# Altium PCB PCB_Interface_Board_7500-0428.PcbDoc (part 1 of 5)
Units mil, origin at the board's own origin, x right, y up, seen from the top; angles counter-clockwise.
Board outline 3850 x 4150 mil, 4 copper layers (Top Layer 1, GND+Signal, PWR+Signal, Bottom Layer 1), stack 62.449 mil thick; 247 components, 137 nets, 1675 pads, 241 vias.
Unrouted connection lines stored in the file: 122.
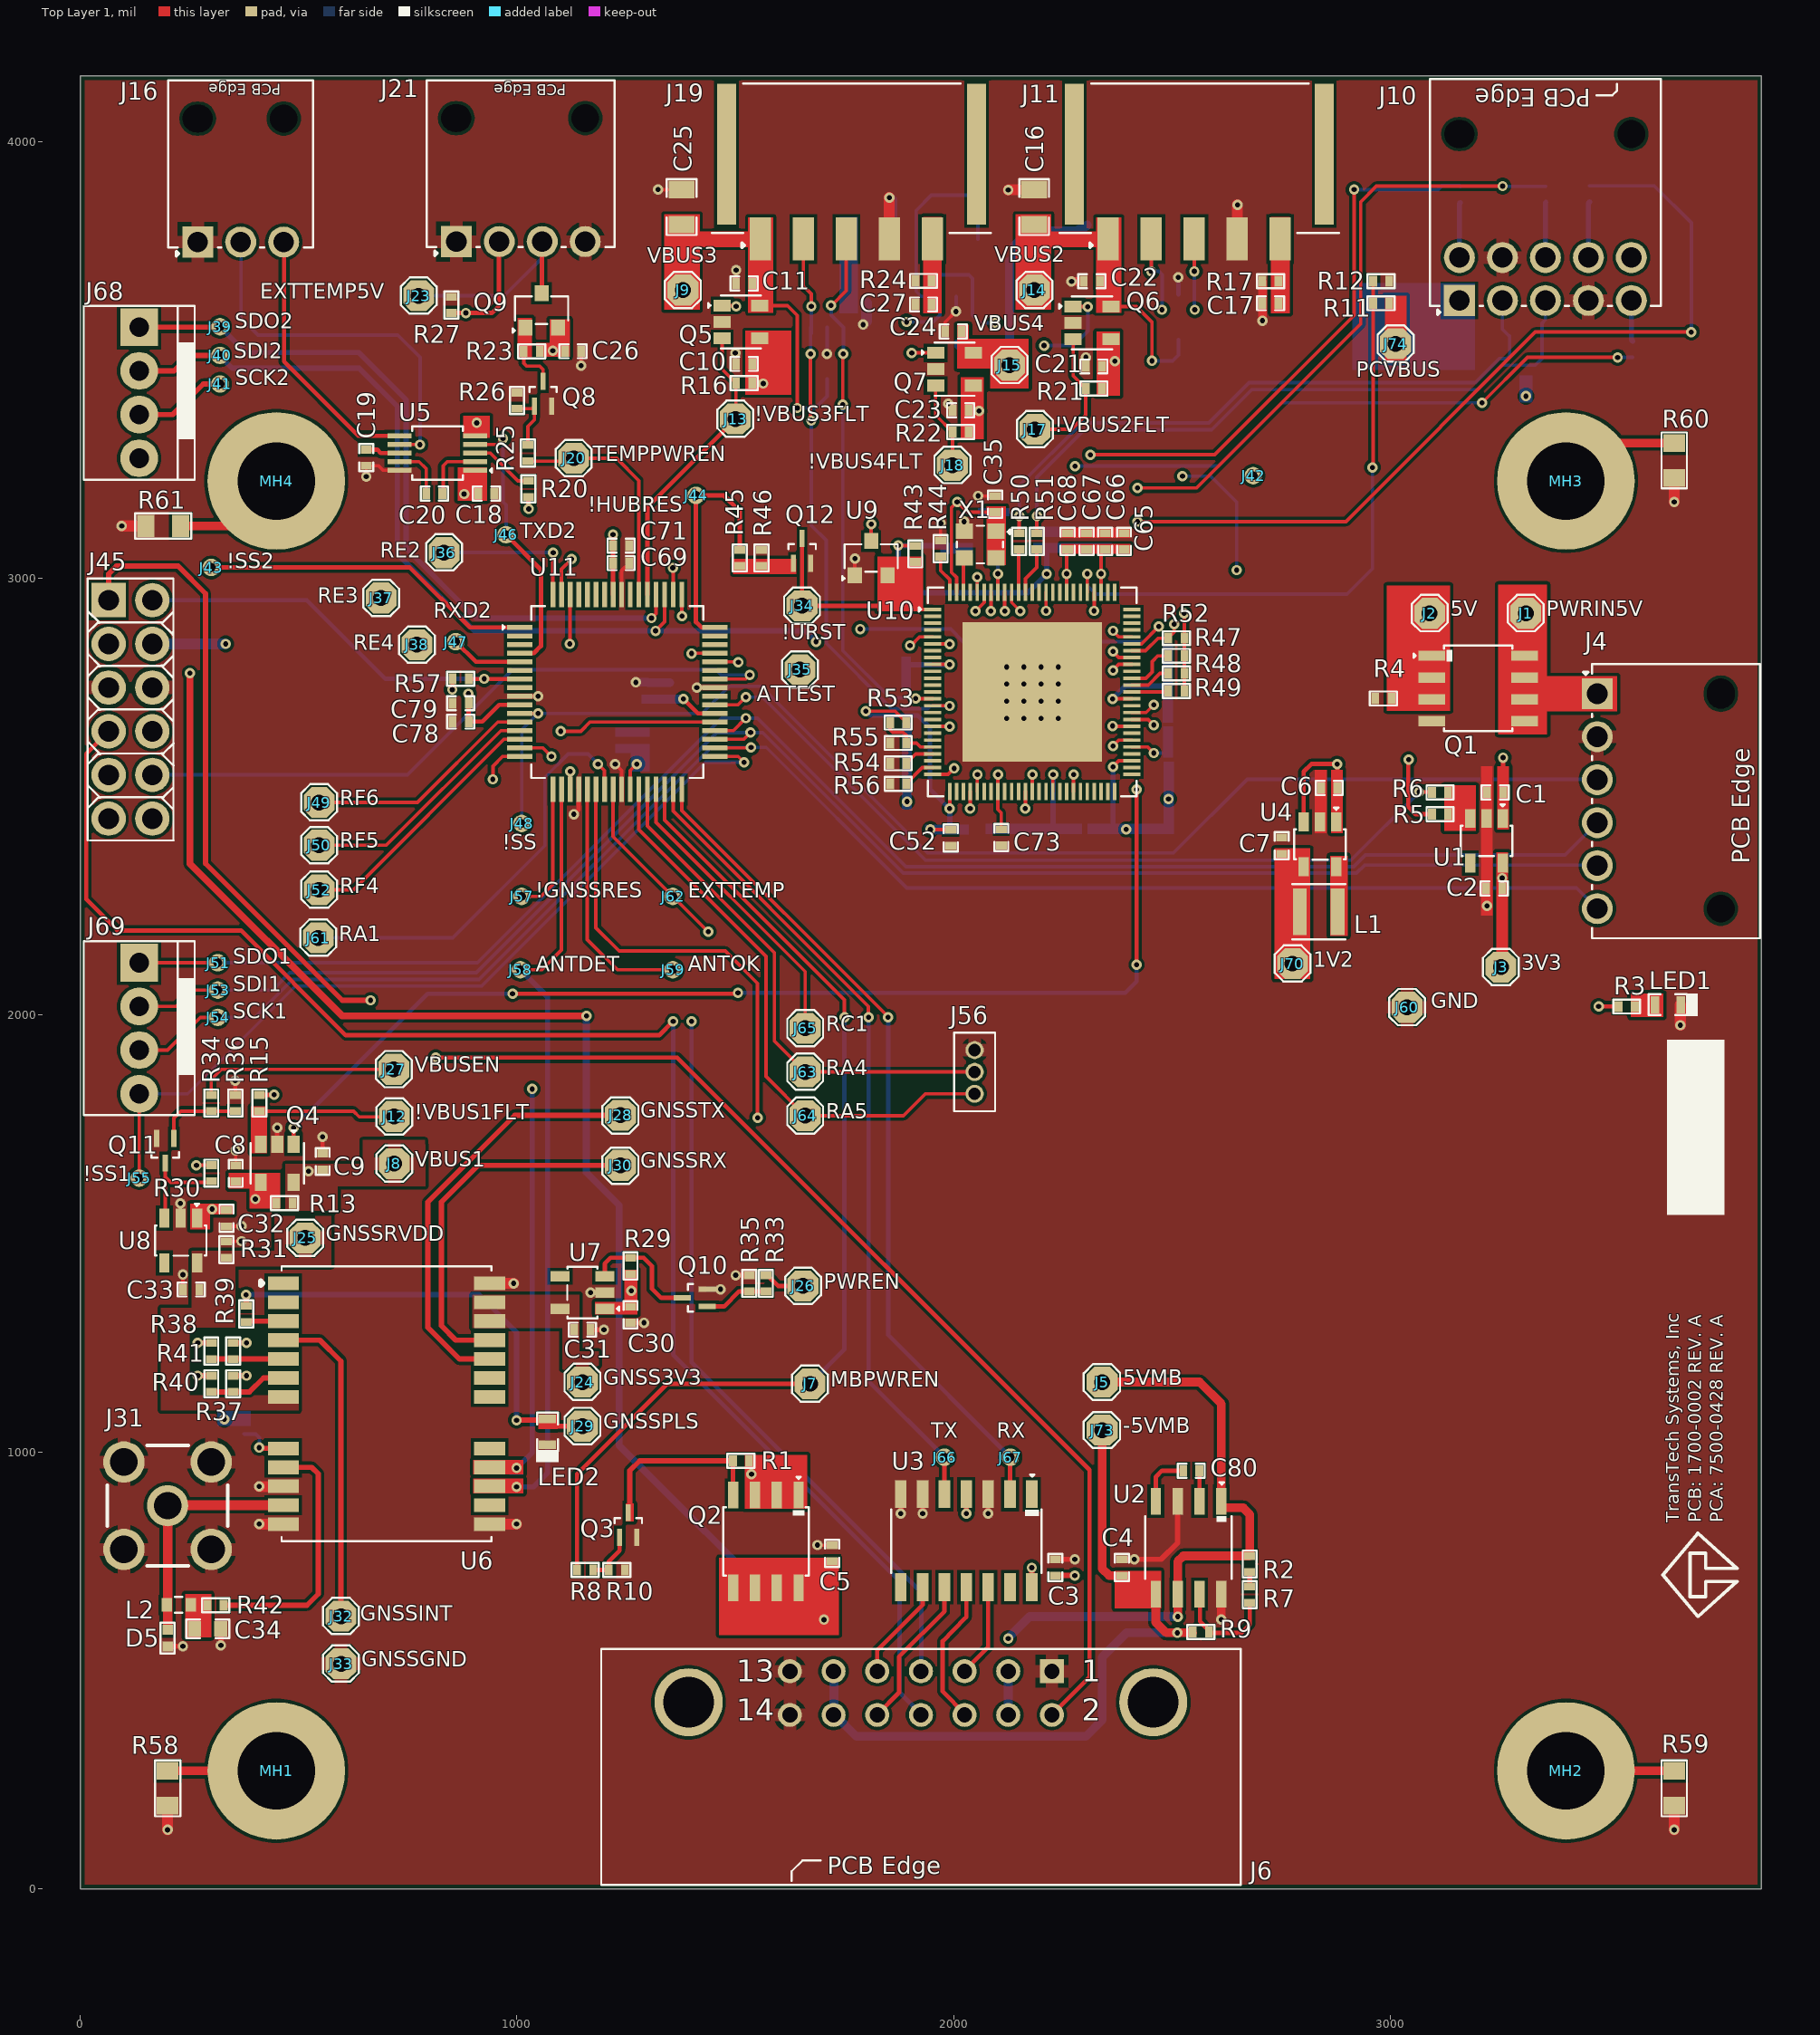
[diagram p0: Top Layer 1 view]
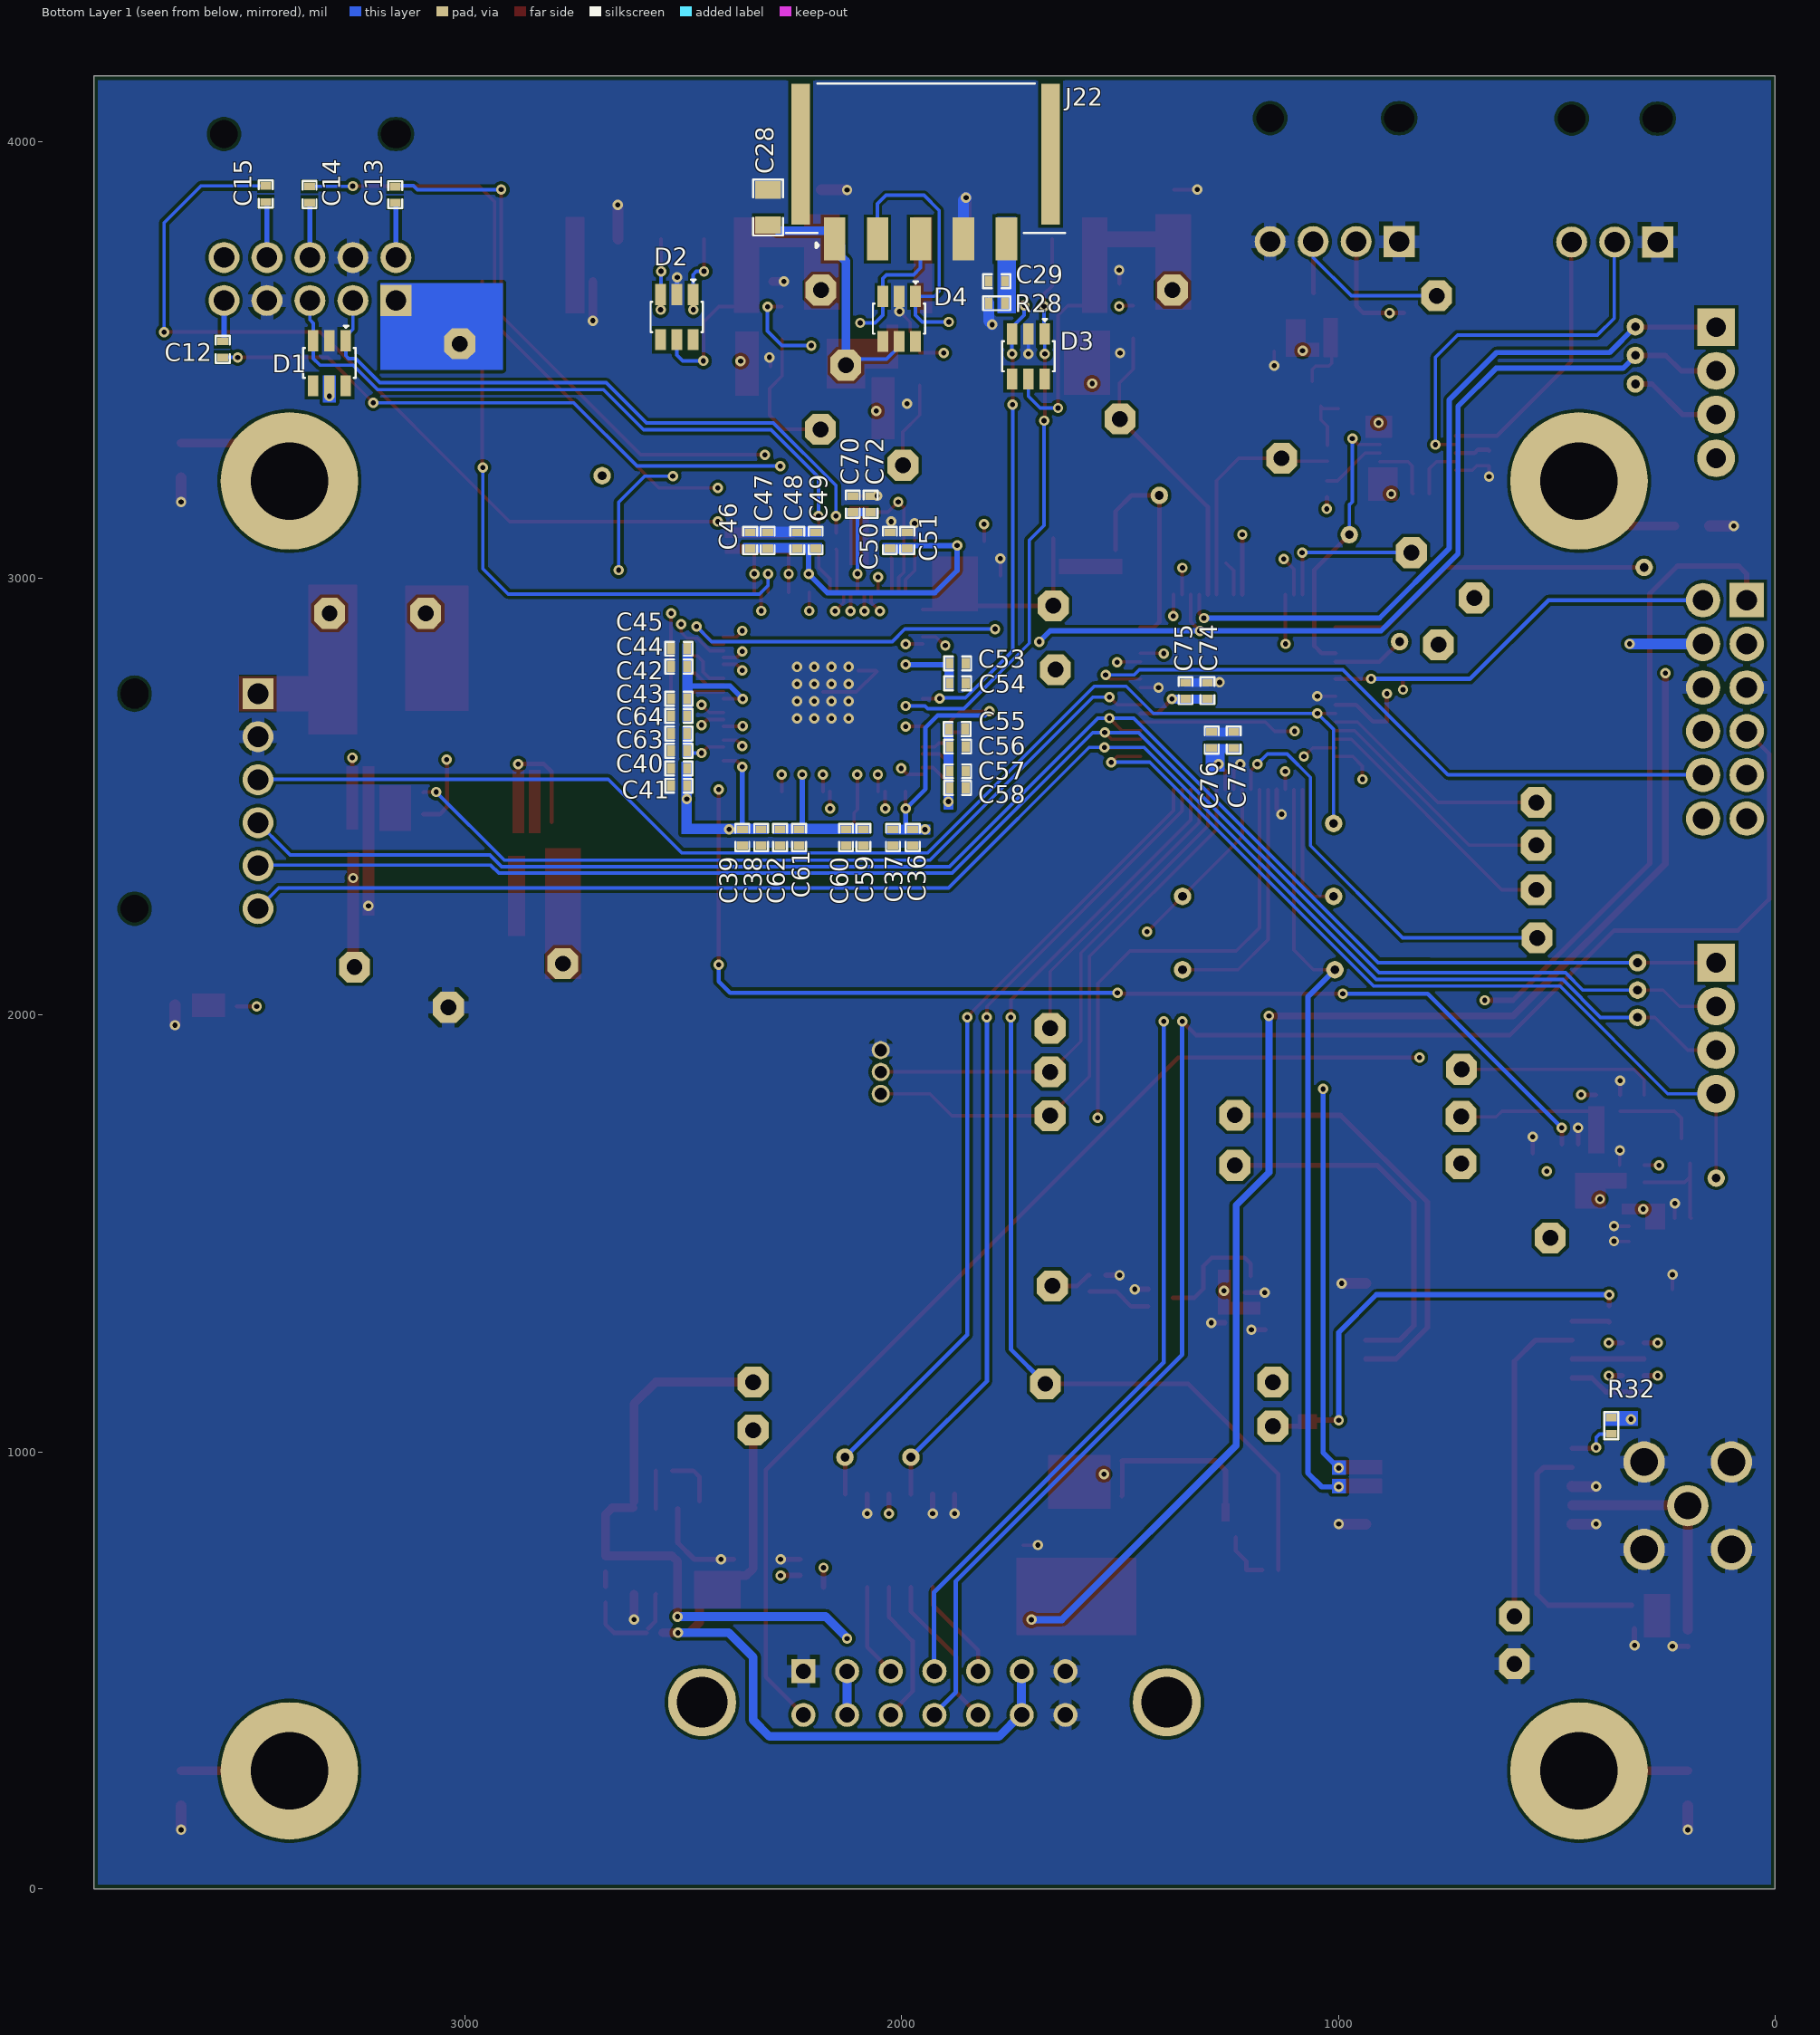
[diagram p1: Bottom Layer 1 view, seen from below]
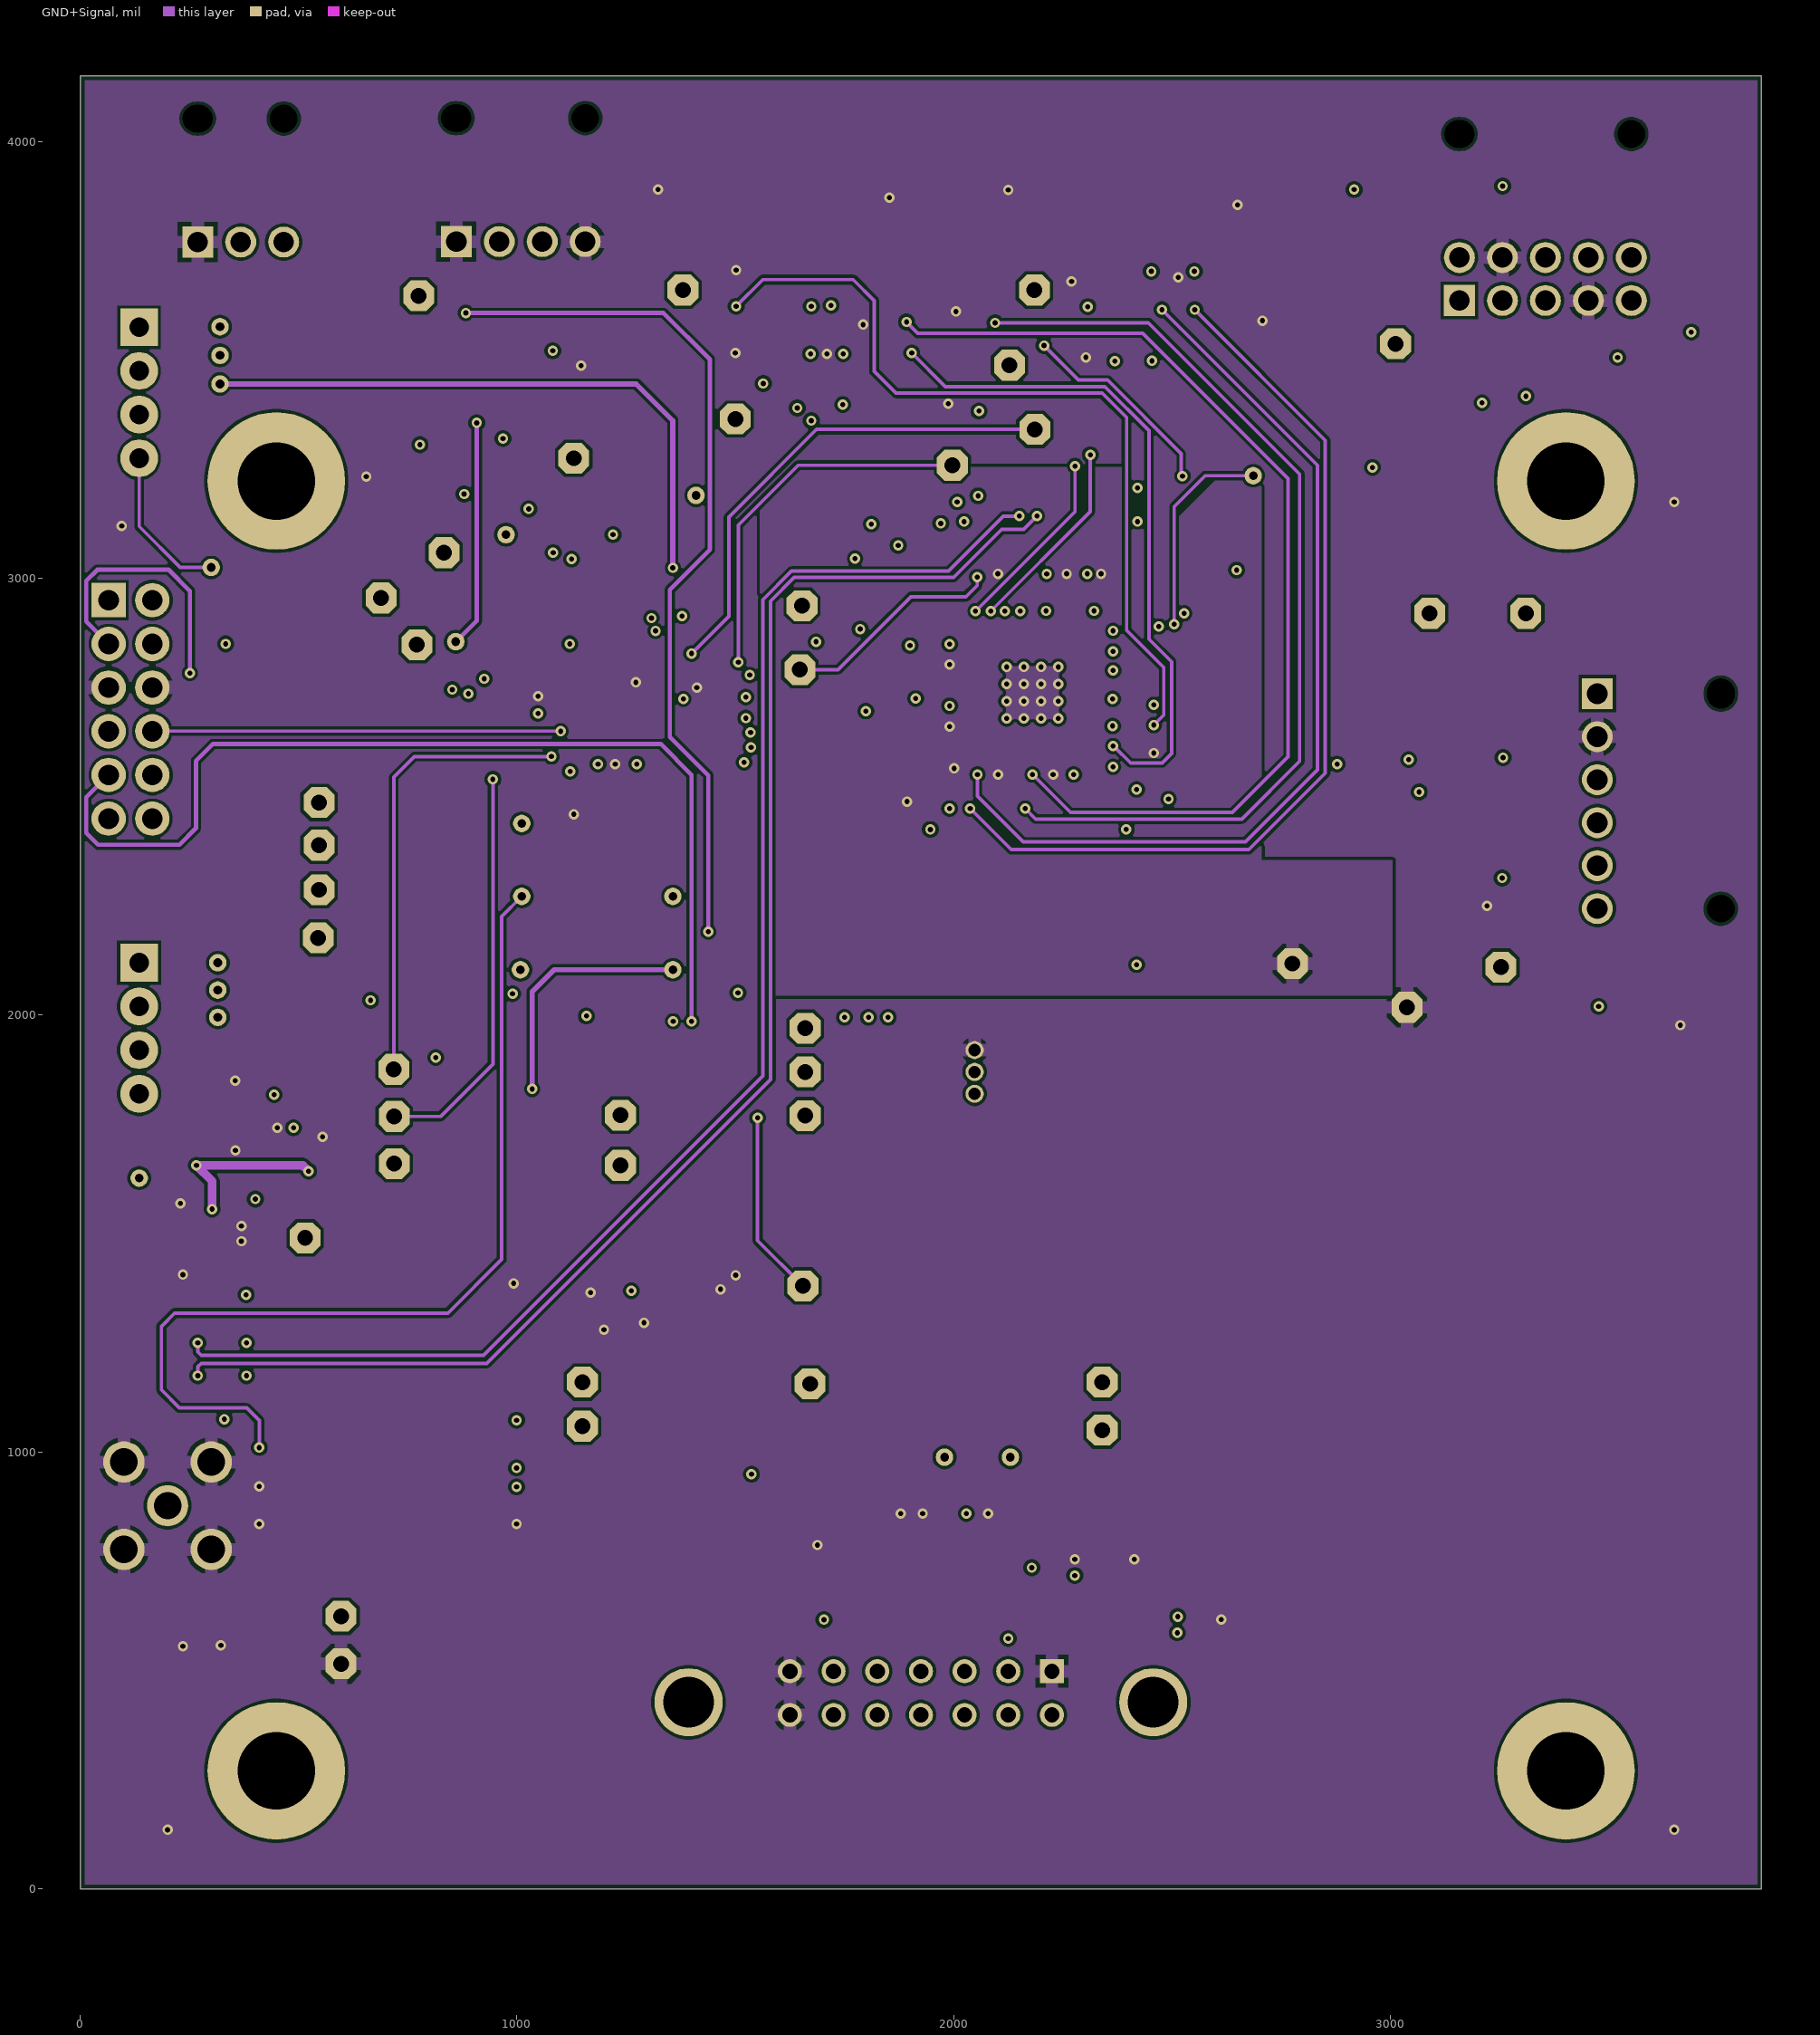
[diagram p2: GND+Signal]
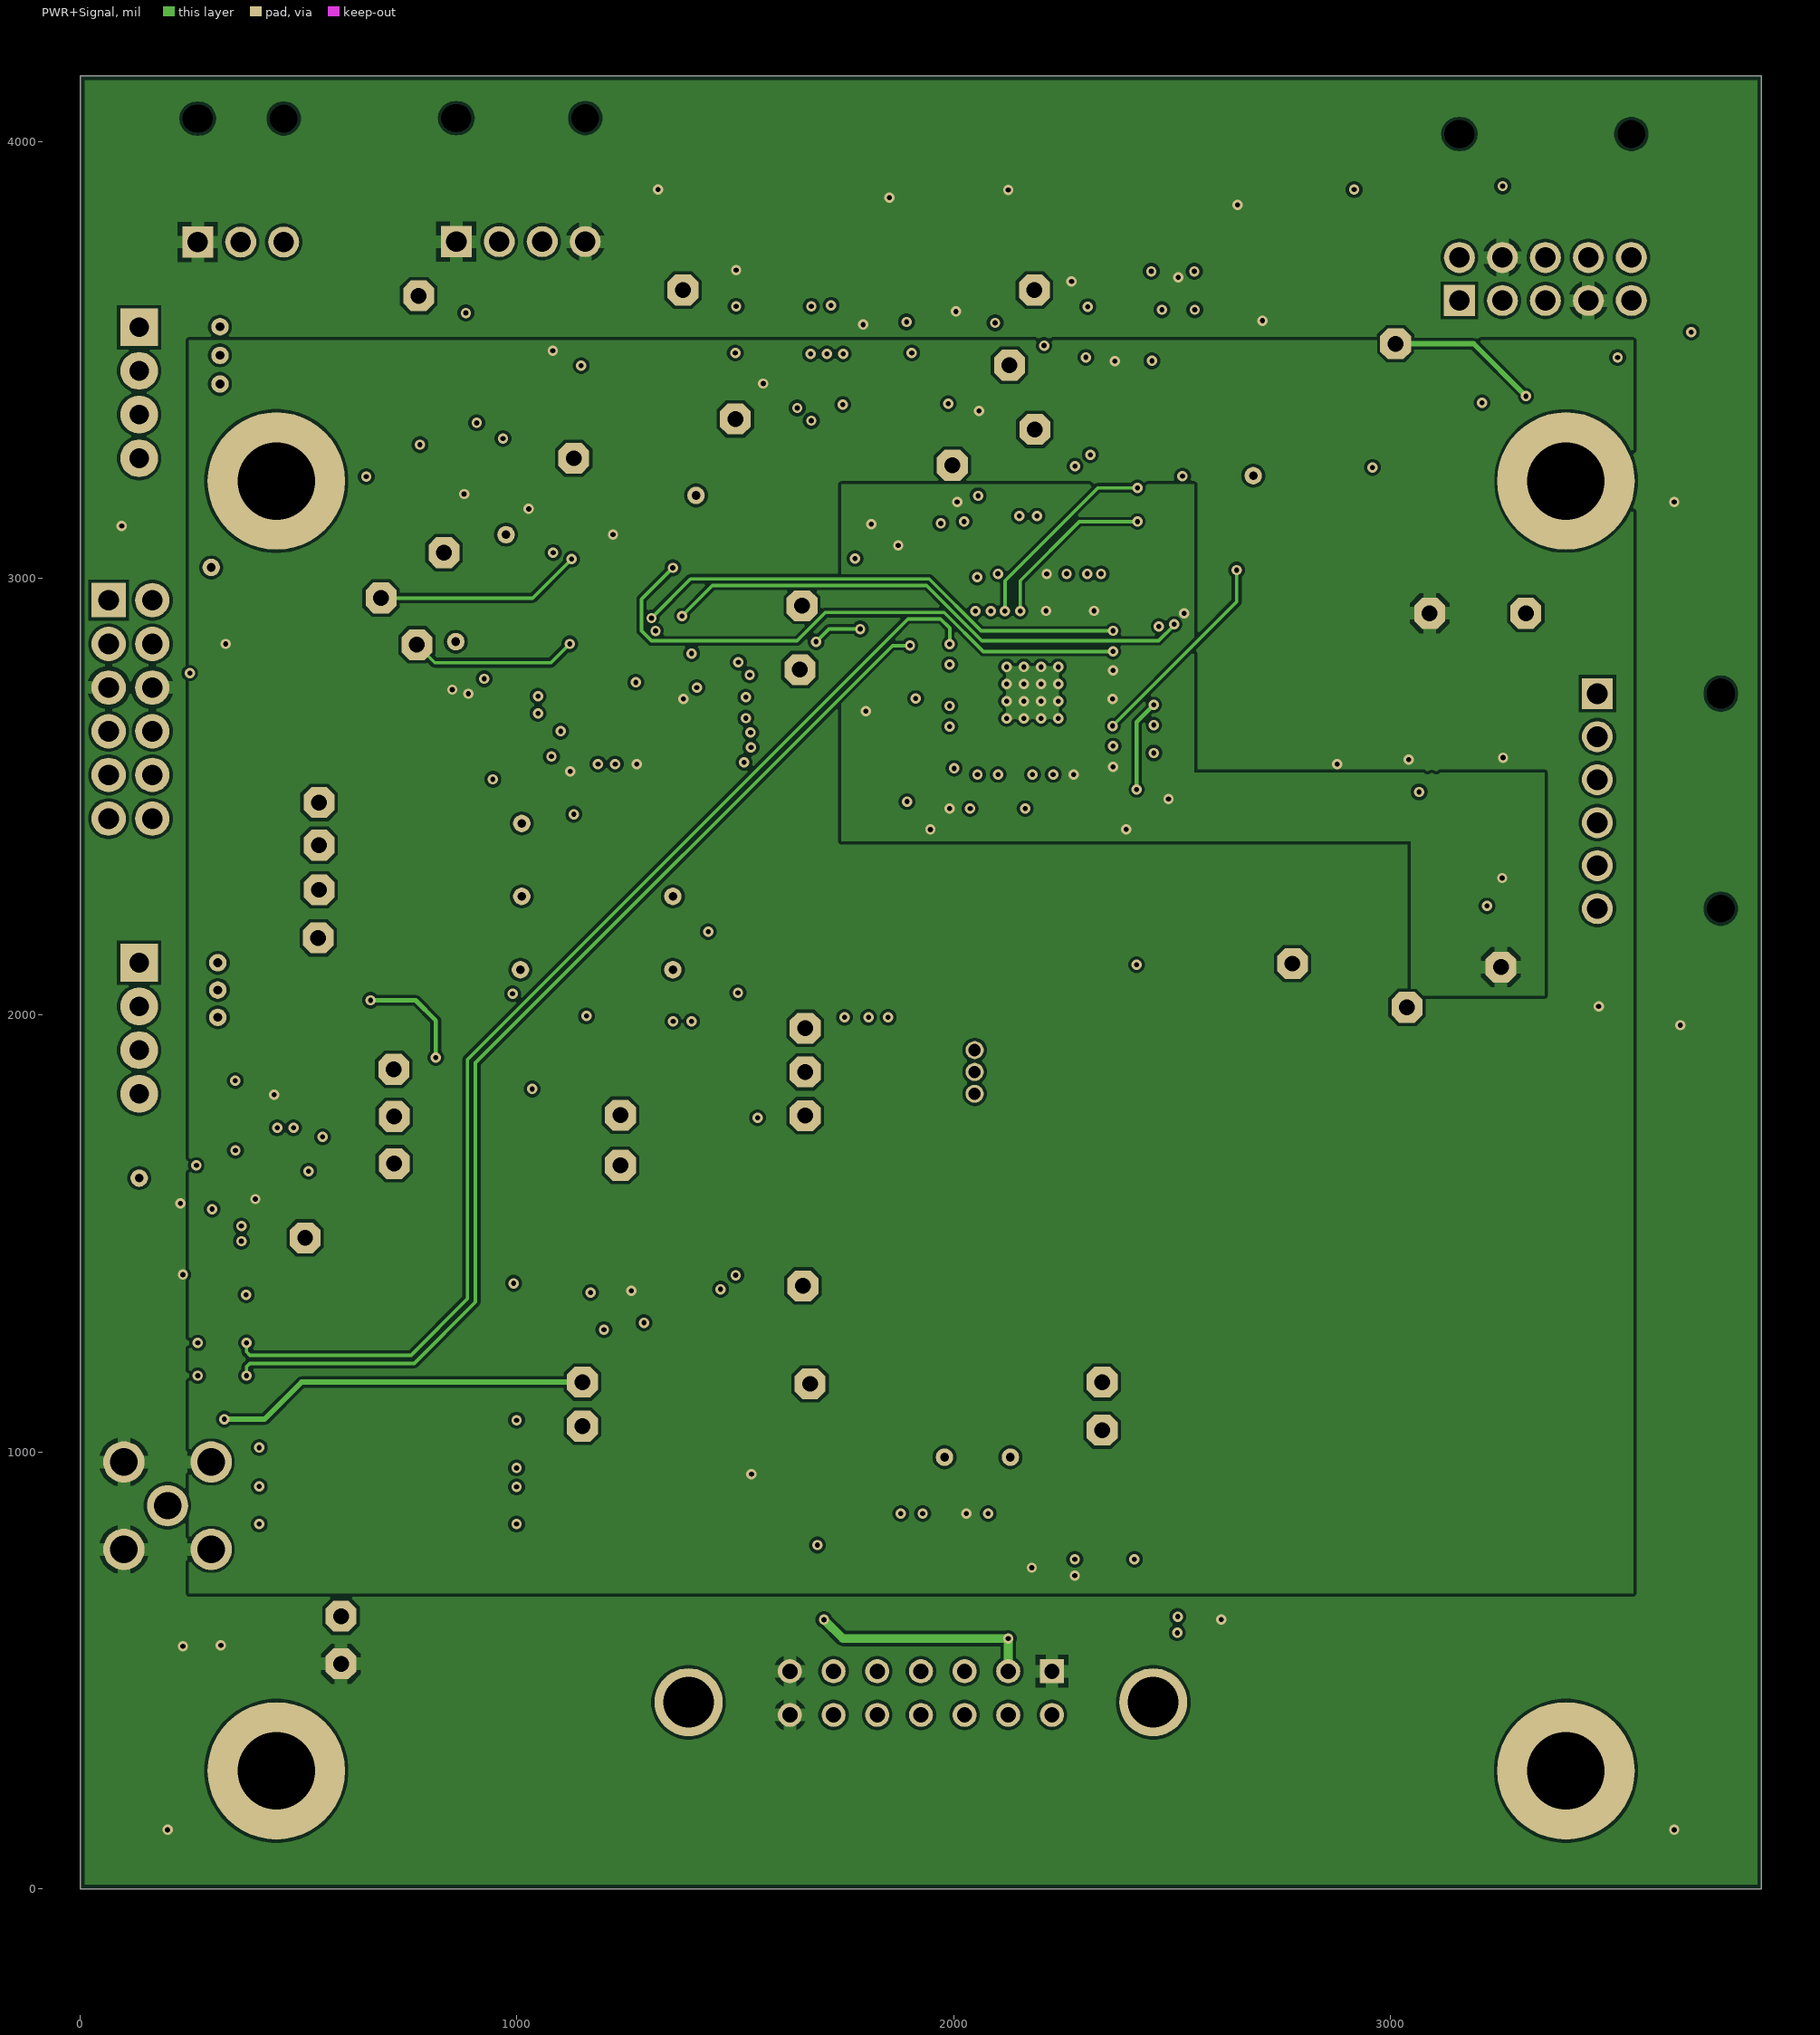
[diagram p3: PWR+Signal]
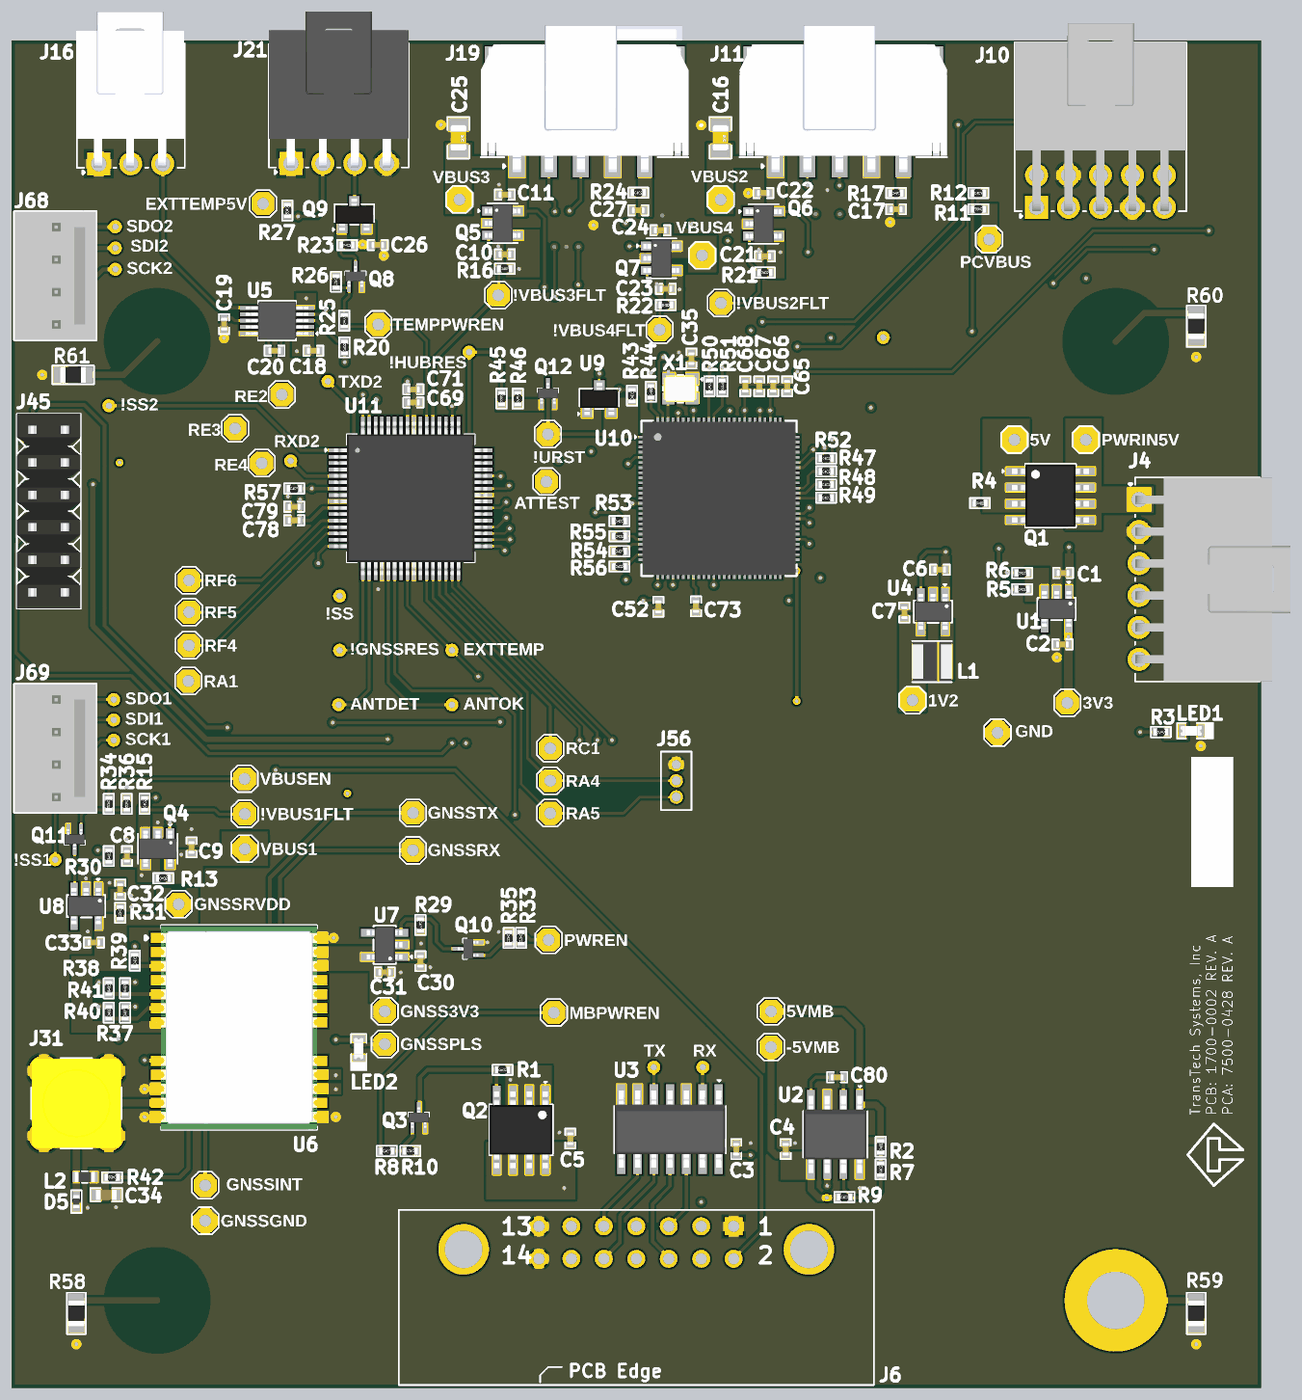
[diagram p6: 3D render of the assembled board from above, using the file's embedded part models]
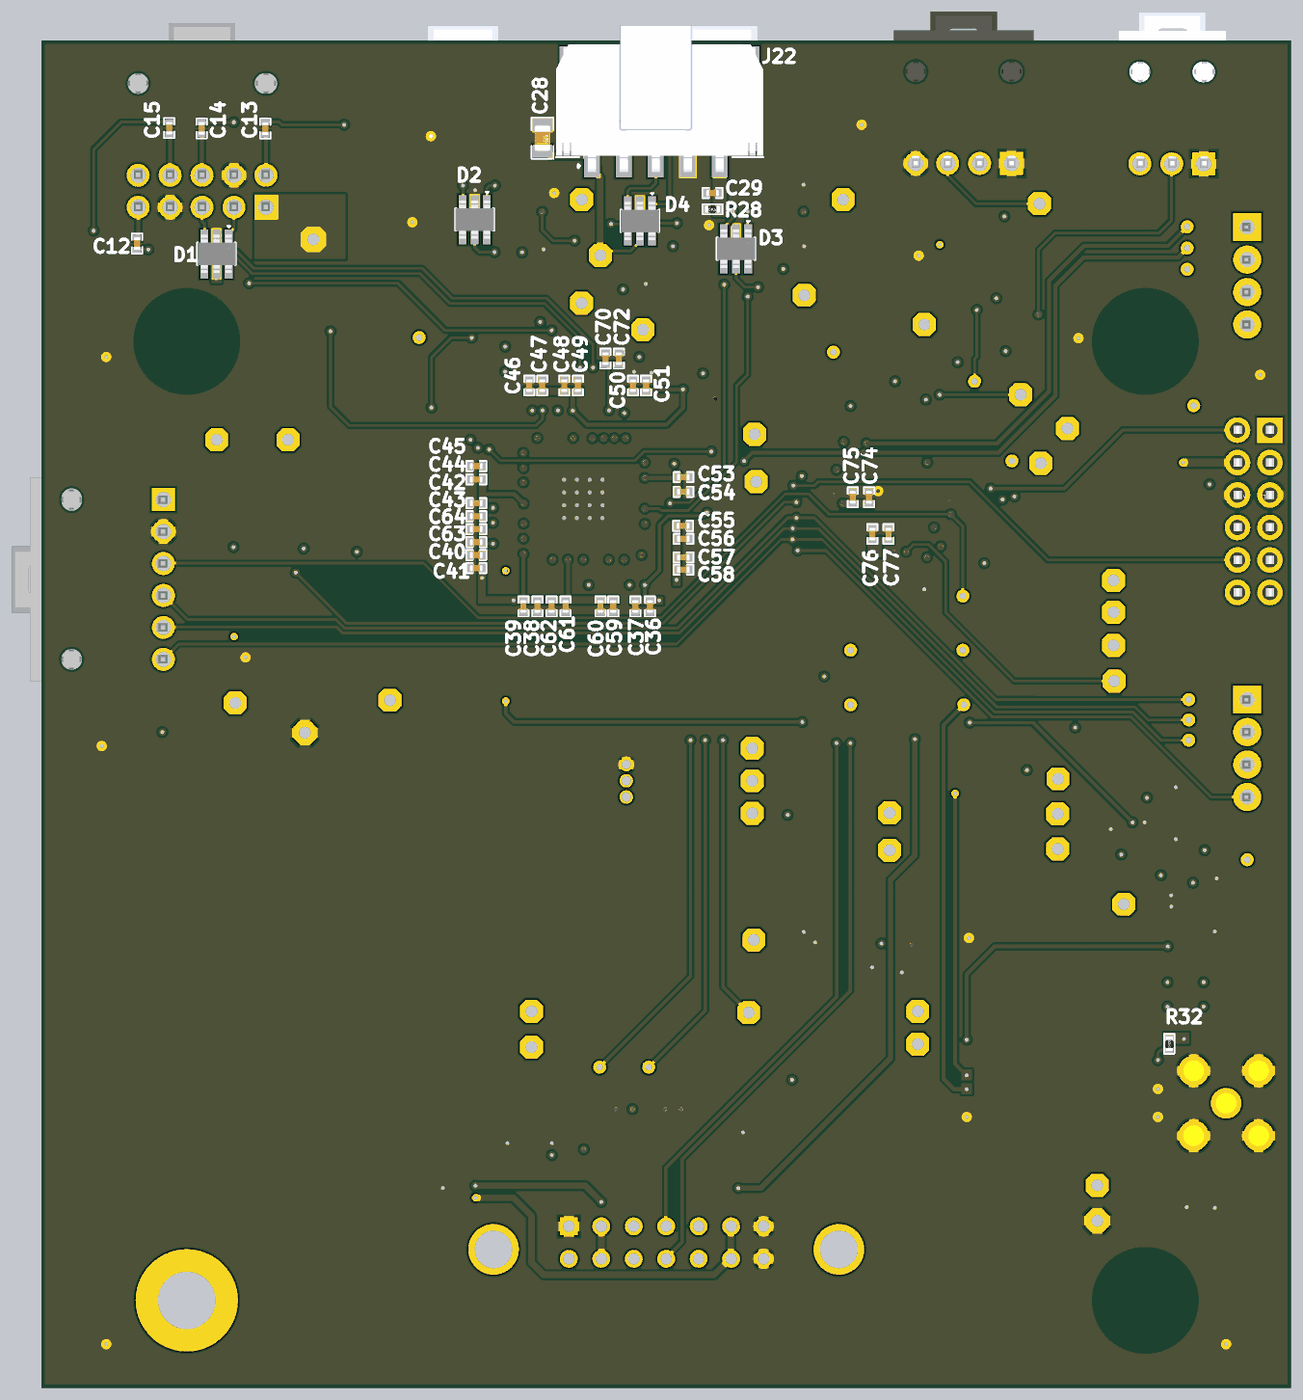
[diagram p7: 3D render of the assembled board from below, using the file's embedded part models]

## Layer stack, top to bottom
Top Solder: solder mask 0.4, Solder Resist, Dk 3.5
Top Layer 1: signal copper 1.378
Dielectric 2: prepreg 8.284, PP-006, Dk 4.1
GND+Signal: signal copper 0.598
Dielectric 1: core 41.929, FR-4, Dk 4.8
PWR+Signal: signal copper 0.598
Dielectric 3: prepreg 8.284, PP-006, Dk 4.1
Bottom Layer 1: signal copper 1.378
Bottom Solder: solder mask 0.4, Solder Resist, Dk 3.5

## Board outline
0,0 0,4150 3850,4150 3850,0

## Design rules (kind name [scope] priority, off if disabled: settings)
BoardOutlineClearance [All] p1: gap=0 ignorepadtopadclearanceinfootprint=FALSE except(10: Poly-OutlineEdge)
Clearance [All] p1: gap=7 ignorepadtopadclearanceinfootprint=FALSE except(0: Arc-Hole Track-Hole SMDPad-Hole THPad-Hole Via-Hole Fill-Hole Poly-Hole Region-Hole Text-Hole; 4: Arc-SMDPad Track-SMDPad SMDPad-SMDPad)
HoleSize [All] p1: absolutevalues=TRUE maxlimit=1000 minlimit=1 maxpercent=80.000 minpercent=20.000
HoleToHoleClearance [All] p1: gap=0 allowstackedmicrovias=TRUE
MinimumSolderMaskSliver [All] p1: minsoldermaskwidth=0
PolygonConnect [All] p1: thpad.connectstyle=Relief thpad.reliefconductorwidth=30 thpad.reliefentries=4 thpad.polygonreliefangle="90 Angle" thpad.airgapwidth=10 smdpad.connectstyle=Direct smdpad.reliefconductorwidth=10 smdpad.reliefentries=4 smdpad.polygonreliefangle="90 Angle" smdpad.airgapwidth=10 via.connectstyle=Direct via.reliefconductorwidth=10 via.reliefentries=4 via.polygonreliefangle="90 Angle" via.airgapwidth=10
RoutingVias [All] p1: holewidth=11.81 width=23.62 viastyle="Through Hole" minholewidth=11.81 minwidth=23.62 maxholewidth=11.81 maxwidth=23.62
SilkToSilkClearance [All] p1: silktosilkclearance=0
SilkToSolderMaskClearance [IsPad] p1: minsilkscreentomaskgap=0 clearancetoexposedcopper=TRUE
SolderMaskExpansion [All] p1: expansion=4 istentingtop=FALSE
Width [All] p1: maxlimit=30 minlimit=8 preferedwidth=10
25 further rules are at their usual default settings.

## Classes and differential pairs
component class U_Power_Section: C1 C2 C3 C4 C5 C6 C7 C8 C9 C10 C11 C12 C13 C14 C15 C16 C17 C18 C19 C20 C21 C22 C23 C24 C25 C26 C27 C28 C29 C30 C31 C32 C33 C34 C80 D1 D2 D3 D4 D5 J1 J2 J3 J4 J5 J6 J7 J8 J9 J10 J11 J12 J13 J14 J15 J16 J17 J18 J19 J20 J21 J22 J23 J24 J25 J26 J27 J28 J29 J30 J31 J32 J33 J70 J73 J74 L1 L2 LED1 LED2 MH1 MH2 MH3 MH4 Q1 Q2 Q3 Q4 Q5 Q6 Q7 Q8 Q9 Q10 Q11 R1 R2 R3 R4 R5 R6 R7 R8 R9 R10 R11 R12 R13 R15 R16 R17 R20 R21 R22 R23 R24 R25 R26 R27 R28 R29 R30 R31 R32 R33 R34 R35 R36 R37 R38 R39 R40 R41 R42 R58 R59 R60 R61 U1 U2 U3 U4 U5 U6 U7 U8
component class U_Controller_Section: C35 C36 C37 C38 C39 C40 C41 C42 C43 C44 C45 C46 C47 C48 C49 C50 C51 C52 C53 C54 C55 C56 C57 C58 C59 C60 C61 C62 C63 C64 C65 C66 C67 C68 C69 C70 C71 C72 C73 C74 C75 C76 C77 C78 C79 J34 J35 J36 J37 J38 J39 J40 J41 J42 J43 J44 J45 J46 J47 J48 J49 J50 J51 J52 J53 J54 J55 J56 J57 J58 J59 J60 J61 J62 J63 J64 J65 J66 J67 J68 J69 Q12 R43 R44 R45 R46 R47 R48 R49 R50 R51 R52 R53 R54 R55 R56 R57 U9 U10 U11 X1

## Components (designator, comment, footprint, x,y, rotation, side; value= is the part's Value field where it differs from the comment)
C1 "1uF" Cap-0402 3240,2510 r180 top locked
C2 "1uF" Cap-0402 3238,2290 r180 top locked
C3 "0.1uF" Cap-0402 2233,735.7 r90 top locked value=100nF
C4 "22uF" Cap-0402 2385,735.7 r270 top locked
C5 "22uF" Cap-0402 1722,768 r270 top locked
C6 "4.7uF" Cap-0402 2860,2520 r0 top locked
C7 "10uF" Cap-0402 2751,2388 r270 top locked
C8 "1uF" Cap-0402 356,1638 r90 top locked
C9 "0.1uF" Cap-0402 555,1665 r90 top locked value=100nF
C10 "1uF" Cap-0402 1520,3491 r180 top locked
C11 "0.1uF" Cap-0402 1520,3675 r180 top locked value=100nF
C12 "0.1uF" Cap-0402 3555,3524.3 r270 bottom locked value=100nF
C13 "0.1uF" Cap-0402 3160,3878.5 r90 bottom locked value=100nF
C14 "0.1uF" Cap-0402 3356,3879 r90 bottom locked value=100nF
C15 "0.1uF" Cap-0402 3456,3880 r90 bottom locked value=100nF
C16 "47uF" Cap-0805 2184.25,3850 r270 top locked
C17 "0.1uF" Cap-0402 2725.5,3630 r0 top locked value=100nF
C18 "0.1uF" Cap-0402 930,3194 r180 top locked value=100nF
C19 "0.1uF" Cap-0402 655,3276.3 r270 top locked value=100nF
C20 "0.1uF" Cap-0402 810.7,3194 r180 top locked value=100nF
C21 "1uF" Cap-0402 2321.11,3485 r180 top locked
C22 "0.1uF" Cap-0402 2316.3,3680 r180 top locked value=100nF
C23 "1uF" Cap-0402 2016.11,3385 r180 top locked
C24 "0.1uF" Cap-0402 1999,3565 r180 top locked value=100nF
C25 "47uF" Cap-0805 1377,3850 r270 top locked
C26 "4.7uF" Cap-0402 1128.5,3520 r180 top locked
C27 "0.1uF" Cap-0402 1931.03,3627 r0 top locked value=100nF
C28 "47uF" Cap-0805 2306,3849 r270 bottom locked
C29 "0.1uF" Cap-0402 1782.3,3680 r180 bottom locked value=100nF
C30 "1uF" Cap-0402 1260,1314.3 r270 top locked
C31 "1uF" Cap-0402 1150,1280 r0 top locked
C32 "1uF" Cap-0402 335,1535 r270 top locked
C33 "1uF" Cap-0402 254.15,1372 r180 top locked
C34 "10nF" Cap-0603 292,595 r0 top locked
C35 "0.1uF" Cap-0402 2095,3170 r90 top locked value=100nF
C36 "1nF" Cap-0402 1975,2407 r270 bottom locked
C37 "0.1uF" Cap-0402 2020,2407 r270 bottom locked value=100nF
C38 "1nF" Cap-0402 2321.6,2407 r270 bottom locked
C39 "0.1uF" Cap-0402 2365,2407 r270 bottom locked value=100nF
C40 "1nF" Cap-0402 2510,2564.96 r0 bottom locked
C41 "0.1uF" Cap-0402 2510,2525 r0 bottom locked value=100nF
C42 "1nF" Cap-0402 2510,2724.81 r0 bottom locked
C43 "0.1uF" Cap-0402 2510,2684.85 r0 bottom locked value=100nF
C44 "1nF" Cap-0402 2510,2798.21 r0 bottom locked
C45 "0.1uF" Cap-0402 2510,2839 r0 bottom locked value=100nF
C46 "1nF" Cap-0402 2347,3087 r90 bottom locked
C47 "0.1uF" Cap-0402 2307,3087 r90 bottom locked value=100nF
C48 "1nF" Cap-0402 2239,3087 r90 bottom locked
C49 "0.1uF" Cap-0402 2197,3087 r90 bottom locked value=100nF
C50 "1nF" Cap-0402 2027,3087 r90 bottom locked
C51 "0.1uF" Cap-0402 1987,3087 r90 bottom locked value=100nF
C52 "4.7uF" Cap-0402 1993,2406 r270 top locked
C53 "1nF" Cap-0402 1872,2805 r180 bottom locked
C54 "0.1uF" Cap-0402 1872,2760 r180 bottom locked value=100nF
C55 "1nF" Cap-0402 1873,2655 r180 bottom locked
C56 "0.1uF" Cap-0402 1872,2615 r180 bottom locked value=100nF
C57 "1nF" Cap-0402 1872,2558.19 r180 bottom locked
C58 "0.1uF" Cap-0402 1872,2520 r180 bottom locked value=100nF
C59 "1nF" Cap-0402 2088,2407 r270 bottom locked
C60 "0.1uF" Cap-0402 2127.58,2407 r270 bottom locked value=100nF
C61 "1nF" Cap-0402 2234.8,2407 r270 bottom locked
C62 "0.1uF" Cap-0402 2278.2,2407 r270 bottom locked value=100nF
C63 "1nF" Cap-0402 2510,2604.92 r0 bottom locked
C64 "0.1uF" Cap-0402 2510,2644.89 r0 bottom locked value=100nF
C65 "1nF" Cap-0402 2390,3085 r90 top locked
C66 "0.1uF" Cap-0402 2347,3085 r90 top locked value=100nF
C67 "1nF" Cap-0402 2304,3085 r90 top locked
C68 "0.1uF" Cap-0402 2261,3085 r90 top locked value=100nF
C69 "0.1uF" Cap-0402 1238.5,3035 r0 top locked value=100nF
C70 "1nF" Cap-0402 2112,3170 r90 bottom locked
C71 "10uF" Cap-0402 1238.5,3075 r0 top locked
C72 "0.1uF" Cap-0402 2071,3170 r90 bottom locked value=100nF
C73 "4.7uF" Cap-0402 2109,2407 r270 top locked
C74 "0.1uF" Cap-0402 1300,2743 r90 bottom locked value=100nF
C75 "10uF" Cap-0402 1350,2743 r90 bottom locked
C76 "0.1uF" Cap-0402 1290,2629.85 r90 bottom locked value=100nF
C77 "10uF" Cap-0402 1240,2629.84 r90 bottom locked
C78 "0.1uF" Cap-0402 871,2672 r180 top locked value=100nF
C79 "10uF" Cap-0402 871,2714 r180 top locked
C80 "4.7uF" Cap-0402 2544,957.14 r0 top locked
D1 "AOZ8904CIL" SOT-23-6 3310.4,3492.57 r270 bottom locked
D2 "AOZ8904CIL" SOT-23-6 2515,3598 r270 bottom locked
D3 "AOZ8904CIL" SOT-23-6 1710,3508 r270 bottom locked
D4 "AOZ8904CIL" SOT-23-6 2006,3594 r270 bottom locked
D5 "ACPDQC3V3HT-HF" "Diode 0402" 200,574 r90 top locked
J1 "Test Point -TH 1.8mm Hole size 0.92mm" "Test Point -TH 1.8mm Hole size 0.92mm"#1 3310,2920 r0 top locked
J2 "Test Point -TH 1.8mm Hole size 0.92mm" "Test Point -TH 1.8mm Hole size 0.92mm"#1 3090,2920 r0 top locked
J3 "Test Point -TH 1.8mm Hole size 0.92mm" "Test Point -TH 1.8mm Hole size 0.92mm"#1 3253,2110 r0 top locked
J4 "105313-1306" 1053131306 3615.34,2489.94 r90 top locked
J5 "Test Point -TH 1.8mm Hole size 0.92mm" "Test Point -TH 1.8mm Hole size 0.92mm"#1 2340,1160 r90 top locked
J6 "N3314-5202RB" N3314-5202RB 2225,498 r180 top locked
J7 "Test Point -TH 1.8mm Hole size 0.92mm" "Test Point -TH 1.8mm Hole size 0.92mm"#1 1671,1156 r0 top locked
J8 "Test Point -TH 1.8mm Hole size 0.92mm" "Test Point -TH 1.8mm Hole size 0.92mm"#1 719,1660 r0 top locked
J9 "Test Point -TH 1.8mm Hole size 0.92mm" "Test Point -TH 1.8mm Hole size 0.92mm"#1 1380,3660 r0 top locked
J10 "105314-1310" 1053141310 3355,3826.7 r180 top locked
J11 "105430-1305" 1054301305 2562.66,3874 r180 top locked
J12 "Test Point -TH 1.8mm Hole size 0.92mm" "Test Point -TH 1.8mm Hole size 0.92mm"#1 719,1768 r0 top locked
J13 "Test Point -TH 1.8mm Hole size 0.92mm" "Test Point -TH 1.8mm Hole size 0.92mm"#1 1500,3365 r0 top locked
J14 "Test Point -TH 1.8mm Hole size 0.92mm" "Test Point -TH 1.8mm Hole size 0.92mm"#1 2185,3660 r0 top locked
J15 "Test Point -TH 1.8mm Hole size 0.92mm" "Test Point -TH 1.8mm Hole size 0.92mm"#1 2128,3488 r0 top locked
J16 "105313-1303" 1053131303 367.42,3911.34 r180 top locked
J17 "Test Point -TH 1.8mm Hole size 0.92mm" "Test Point -TH 1.8mm Hole size 0.92mm"#1 2186,3341 r0 top locked
J18 "Test Point -TH 1.8mm Hole size 0.92mm" "Test Point -TH 1.8mm Hole size 0.92mm"#1 1997,3259 r0 top locked
J19 "105430-1305" 1054301305 1766,3874 r180 top locked
J20 "Test Point -TH 1.8mm Hole size 0.92mm" "Test Point -TH 1.8mm Hole size 0.92mm"#1 1130,3275 r0 top locked
J21 "105313-1304" 1053131304 1008.64,3912.34 r180 top locked
J22 "105430-1305" 1054301305 1945.22,3874 r0 bottom locked
J23 "Test Point -TH 1.8mm Hole size 0.92mm" "Test Point -TH 1.8mm Hole size 0.92mm"#1 775,3647 r0 top locked
J24 "Test Point -TH 1.8mm Hole size 0.92mm" "Test Point -TH 1.8mm Hole size 0.92mm"#1 1150,1160 r0 top locked
J25 "Test Point -TH 1.8mm Hole size 0.92mm" "Test Point -TH 1.8mm Hole size 0.92mm"#1 515,1490 r0 top locked
J26 "Test Point -TH 1.8mm Hole size 0.92mm" "Test Point -TH 1.8mm Hole size 0.92mm"#1 1655,1380 r0 top locked
J27 "Test Point -TH 1.8mm Hole size 0.92mm" "Test Point -TH 1.8mm Hole size 0.92mm"#1 718,1876 r0 top locked
J28 "Test Point -TH 1.8mm Hole size 0.92mm" "Test Point -TH 1.8mm Hole size 0.92mm"#1 1237,1771 r180 top locked
J29 "Test Point -TH 1.8mm Hole size 0.92mm" "Test Point -TH 1.8mm Hole size 0.92mm"#1 1150,1059 r0 top locked
J30 "Test Point -TH 1.8mm Hole size 0.92mm" "Test Point -TH 1.8mm Hole size 0.92mm"#1 1237,1656 r180 top locked
J31 "SMA-J-P-H-ST-TH1" SMA-J-P-H-ST-TH1 200,877 r0 top locked
J32 "Test Point -TH 1.8mm Hole size 0.92mm" "Test Point -TH 1.8mm Hole size 0.92mm"#1 597,624 r0 top locked
J33 "Test Point -TH 1.8mm Hole size 0.92mm" "Test Point -TH 1.8mm Hole size 0.92mm"#1 597,515 r0 top locked
J34 "Test Point -TH 1.8mm Hole size 0.92mm" "Test Point -TH 1.8mm Hole size 0.92mm"#1 1652.81,2937.19 r0 top locked
J35 "Test Point -TH 1.8mm Hole size 0.92mm" "Test Point -TH 1.8mm Hole size 0.92mm"#1 1648,2791 r0 top locked
J36 "Test Point -TH 1.8mm Hole size 0.92mm" "Test Point -TH 1.8mm Hole size 0.92mm"#1 833,3059 r0 top locked
J37 "Test Point -TH 1.8mm Hole size 0.92mm" "Test Point -TH 1.8mm Hole size 0.92mm"#1 689,2955 r0 top locked
J38 "Test Point -TH 1.8mm Hole size 0.92mm" "Test Point -TH 1.8mm Hole size 0.92mm"#1 771,2848 r0 top locked
J39 "Test Point -TH 1.8mm Hole size 0.92mm" "Test Point -TH 1.8mm Hole size 0.92mm"#2 87,3750 r0 top locked
J40 "Test Point -TH 1.8mm Hole size 0.92mm" "Test Point -TH 1.8mm Hole size 0.92mm"#3 328,3480.5 r0 top locked
J41 "Test Point -TH 1.8mm Hole size 0.92mm" "Test Point -TH 1.8mm Hole size 0.92mm"#4 452,3566 r0 top locked
J42 "Test Point -TH 1.8mm Hole size 0.92mm" "Test Point -TH 1.8mm Hole size 0.92mm"#5 2686,3235 r0 top locked
J43 "Test Point -TH 1.8mm Hole size 0.92mm" "Test Point -TH 1.8mm Hole size 0.92mm"#5 300,3025 r0 top locked
J44 "Test Point -TH 1.8mm Hole size 0.92mm" "Test Point -TH 1.8mm Hole size 0.92mm"#6 1293,3235 r0 top locked
J45 "0901311086" "HDR 2x6 Straight (2.54mm)" 115,2700 r270 top locked
J46 "Test Point -TH 1.8mm Hole size 0.92mm" "Test Point -TH 1.8mm Hole size 0.92mm"#5 975,3100 r0 top locked
J47 "Test Point -TH 1.8mm Hole size 0.92mm" "Test Point -TH 1.8mm Hole size 0.92mm"#5 860,2855 r0 top locked
J48 "Test Point -TH 1.8mm Hole size 0.92mm" "Test Point -TH 1.8mm Hole size 0.92mm"#5 1011,2439 r0 top locked
J49 "Test Point -TH 1.8mm Hole size 0.92mm" "Test Point -TH 1.8mm Hole size 0.92mm"#1 547,2487 r0 top locked
J50 "Test Point -TH 1.8mm Hole size 0.92mm" "Test Point -TH 1.8mm Hole size 0.92mm"#1 547,2389 r0 top locked
J51 "Test Point -TH 1.8mm Hole size 0.92mm" "Test Point -TH 1.8mm Hole size 0.92mm"#7 128,2315 r0 top locked
J52 "Test Point -TH 1.8mm Hole size 0.92mm" "Test Point -TH 1.8mm Hole size 0.92mm"#1 547,2287 r0 top locked
J53 "Test Point -TH 1.8mm Hole size 0.92mm" "Test Point -TH 1.8mm Hole size 0.92mm"#8 328,2141.5 r0 top locked
J54 "Test Point -TH 1.8mm Hole size 0.92mm" "Test Point -TH 1.8mm Hole size 0.92mm"#9 331,2024 r0 top locked
J55 "Test Point -TH 1.8mm Hole size 0.92mm" "Test Point -TH 1.8mm Hole size 0.92mm"#5 135,1627 r0 top locked
J56 "GRPB031VWVN-RC" "HDR 1x3 Straight (1.27mm)" 2048,1870 r90 top locked
J57 "Test Point -TH 1.8mm Hole size 0.92mm" "Test Point -TH 1.8mm Hole size 0.92mm"#5 1011,2272 r0 top locked
J58 "Test Point -TH 1.8mm Hole size 0.92mm" "Test Point -TH 1.8mm Hole size 0.92mm"#5 1008,2104 r0 top locked
J59 "Test Point -TH 1.8mm Hole size 0.92mm" "Test Point -TH 1.8mm Hole size 0.92mm"#5 1357,2104 r0 top locked
J60 "Test Point -TH 1.8mm Hole size 0.92mm" "Test Point -TH 1.8mm Hole size 0.92mm"#1 3038,2018 r0 top locked
J61 "Test Point -TH 1.8mm Hole size 0.92mm" "Test Point -TH 1.8mm Hole size 0.92mm"#1 545,2177 r0 top locked
J62 "Test Point -TH 1.8mm Hole size 0.92mm" "Test Point -TH 1.8mm Hole size 0.92mm"#5 1357,2272 r0 top locked
J63 "Test Point -TH 1.8mm Hole size 0.92mm" "Test Point -TH 1.8mm Hole size 0.92mm"#1 1660,1870 r0 top locked
J64 "Test Point -TH 1.8mm Hole size 0.92mm" "Test Point -TH 1.8mm Hole size 0.92mm"#1 1660,1770 r0 top locked
J65 "Test Point -TH 1.8mm Hole size 0.92mm" "Test Point -TH 1.8mm Hole size 0.92mm"#1 1660,1970 r0 top locked
J66 "Test Point -TH 1.8mm Hole size 0.92mm" "Test Point -TH 1.8mm Hole size 0.92mm"#5 1979,988 r0 top locked
J67 "Test Point -TH 1.8mm Hole size 0.92mm" "Test Point -TH 1.8mm Hole size 0.92mm"#5 2130,988 r0 top locked
J68 "1718561004" 1718561004 135,3425 r270 top locked
J69 "1718561004" 1718561004 135,1970 r270 top locked
J70 "Test Point -TH 1.8mm Hole size 0.92mm" "Test Point -TH 1.8mm Hole size 0.92mm"#1 2776,2118 r0 top locked
J73 "Test Point -TH 1.8mm Hole size 0.92mm" "Test Point -TH 1.8mm Hole size 0.92mm"#1 2340,1050 r90 top locked
J74 "Test Point -TH 1.8mm Hole size 0.92mm" "Test Point -TH 1.8mm Hole size 0.92mm"#1 3012,3537 r0 top locked
L1 "2.2uH" NR3012T2R2M 2836,2237 r180 top locked
L2 "27nH" "IND-0603 (1608 Metric)" 226,650 r180 top locked
LED1 "RED" LED-0603 3635,2024 r0 top locked
LED2 "Emerald" LED-0603 1070,1046 r270 top locked
MH1 "M4 Mounting Hole" "M4 Mounting Hole"#1 4964.6,222 r0 top locked
MH2 "M4 Mounting Hole" "M4 Mounting Hole"#2 3402,270 r0 top locked
MH3 "M4 Mounting Hole" "M4 Mounting Hole"#3 5710.6,222 r0 top locked
MH4 "M4 Mounting Hole" "M4 Mounting Hole"#4 6083.6,222 r0 top locked
Q1 "SI4463DY" SOIC-8 3201,2748 r0 top locked
Q2 "SI4463DY" SOIC-8 1570,795 r270 top locked
Q3 "MMBT2222ATT3G" MMBT2222ATT3G 1274.5,804.5 r90 top locked
Q4 "AP22816BKAWT-7" TSOT-25 451,1661 r270 top locked
Q5 "AP22816BKAWT-7" TSOT-25 1513,3587 r0 top locked
Q6 "AP22816BKAWT-7" TSOT-25 2317,3585 r0 top locked
Q7 "AP22816BKAWT-7" TSOT-25 2002,3479 r0 top locked
Q8 "MMBT2222ATT3G" MMBT2222ATT3G 1079.5,3394.5 r90 top locked
Q9 "SI2301CDS-T1-BE3" SOT-23 1056.4,3613.37 r0 top locked
Q10 "MMBT2222ATT3G" MMBT2222ATT3G 1435.5,1372.5 r180 top locked
Q11 "MMBT2222ATT3G" MMBT2222ATT3G 175,1718 r270 top locked
Q12 "MMBT2222ATT3G" MMBT2222ATT3G 1672.5,3034.5 r90 top locked
R1 "10K" Res-0402 1513.11,980 r0 top locked
R2 "10K" Res-0402 2678,743.51 r90 top locked
R3 "1.3K" Res-0402 3541.1,2020 r180 top locked
R4 "10K" Res-0402 2983.89,2725 r0 top locked
R5 "0R" Res-0402 3113.89,2460 r0 top locked
R6 "0R" Res-0402 3113.89,2510 r0 top locked
R7 "100K" Res-0402 2678,673.51 r90 top locked
R8 "1K" Res-0402 1156.11,730 r0 top locked
R9 "100K" Res-0402 2566.11,588 r0 top locked
R10 "10K" Res-0402 1228.89,730 r180 top locked
R11 "43K" Res-0402 2978.89,3630 r180 top locked
R12 "49.9K" Res-0402 2978.89,3680 r0 top locked value=49.9kR
R13 "0R" Res-0402 467.89,1570 r0 top locked
R15 "10K" Res-0402 410,1798.89 r90 top locked
R16 "10K" Res-0402 1520,3446.81 r0 top locked
R17 "330R" Res-0402 2725.5,3680 r0 top locked
R20 "10K" Res-0402 1026,3204.9 r90 top locked
R21 "10K" Res-0402 2321.11,3435 r0 top locked
R22 "10K" Res-0402 2016.11,3335 r0 top locked
R23 "10K" Res-0402 1033.89,3520 r0 top locked
R24 "330R" Res-0402 1931.03,3681 r0 top locked
R25 "1K" Res-0402 1025,3286.85 r90 top locked
R26 "10K" Res-0402 1000,3406.85 r270 top locked
R27 "1M" Res-0402 850,3626.1 r270 top locked
R28 "330R" Res-0402 1782.3,3630 r180 bottom locked
R29 "10K" Res-0402 1260,1426.11 r270 top locked
R30 "10K" Res-0402 300,1638.11 r90 top locked
R31 "10K" Res-0402 335,1463.5 r270 top locked
R32 "11K" Res-0402 374.98,1060 r90 bottom locked value=11kR
R33 "1K" Res-0402 1570,1386.11 r270 top locked
R34 "1K" Res-0402 300,1798.89 r270 top locked
R35 "10K" Res-0402 1531.81,1386.11 r270 top locked
R36 "10K" Res-0402 355,1798.89 r270 top locked
R37 "27R" Res-0402 350,1156.11 r90 top locked
R38 "27R" Res-0402 350,1231.11 r90 top locked
R39 "100R" Res-0402 380,1316.11 r90 top locked
R40 "27R" Res-0402 300,1156.11 r90 top locked
R41 "27R" Res-0402 300,1231.11 r90 top locked
R42 "10R" Res-0402 310,649 r180 top locked
R43 "100K" Res-0402 1912,3056.11 r90 top locked
R44 "12K" Res-0402 1970,3068.35 r90 top locked value=12kR
R45 "1K" Res-0402 1510,3046.85 r270 top locked
R46 "10K" Res-0402 1560,3046.85 r270 top locked
R47 "10K" Res-0402 2510,2822.6 r0 top locked
R48 "10K" Res-0402 2510,2782.21 r0 top locked
R49 "10K" Res-0402 2510,2741.81 r0 top locked
R50 "0R" Res-0402 2150,3085 r90 top locked
R51 "0R" Res-0402 2190,3085 r90 top locked
R52 "10K" Res-0402 2510,2863 r0 top locked
R53 "10K" Res-0402 1873,2670 r0 top locked
R54 "200K" Res-0402 1873,2576.67 r0 top locked
R55 "10K" Res-0402 1873,2623.33 r0 top locked
R56 "10K" Res-0402 1873,2530 r0 top locked
R57 "10K" Res-0402 871,2770 r0 top locked
R58 "0R" Res-0805 200,230 r90 top locked
R59 "0R" Res-0805 3650,230 r90 top locked
R60 "0R" Res-0805 3650,3270 r90 top locked
R61 "0R" Res-0805 190,3120 r0 top locked
U1 "LP5907MFX-3.3/NOPB" SOT-23-5 3220,2399 r270 top locked
U2 "MAX889RESA+" "SOIC-8(0.154\", 3.90mm Width)" 2538,781 r270 top locked
U3 "MAX3080EESD+T" SOIC-14 2029,797 r270 top locked
U4 "LM3674MFX-1.2/NOPB" SOT-23-5 2839,2391 r270 top locked
U5 "MAX3311EEUB+T" 10-MSOP 818,3287 r180 top locked
U6 "NEO-M8Q-01A" NEO-M8Q-01A 701.22,1110.41 r0 top locked
U7 "LP5907MFX-3.3/NOPB" SOT-23-5 1149.82,1365 r180 top locked
U8 "LP5907MFX-3.3/NOPB" SOT-23-5 230,1484 r270 top locked
U9 "MIC803-29D4VM3-TR" SOT-23 1811,3046 r0 top locked
U10 "USB7002-I/KDX" "100-VQFN (12x12)" 2180,2740 r0 top locked
U11 "PIC18F6627T-E/PT" "64-TQFP (10x10)" 1230,2740 r0 top locked
X1 "25MHz" SMD2520-4P 2060.42,3077.49 r180 top locked

## Footprints (in the part's own frame and the unit in brackets; to place one, negate y for a bottom-side part, rotate by r counter-clockwise, add the part's x,y. Pads: shape width x height; smd on the part's side, far side on the other; paste and mask are expansions set on the pad)
10-MSOP [mm]
  rect 1.4x0.3 smd: 1(-2.2,1) 2(-2.2,0.5) 3(-2.2,0) 4(-2.2,-0.5) 5(-2.2,-1) 6(2.2,-1) 7(2.2,-0.5) 8(2.2,0) 9(2.2,0.5) 10(2.2,1)
  silkscreen extent -3.18,-1.55 1.47,1.55, body extent -2.45,-1.5 2.45,1.5, height 1.07
"64-TQFP (10x10)" [mm]
  rect 1.47x0.28 smd: 1(-5.67,3.75) 2(-5.67,3.25) 3(-5.67,2.75) 4(-5.67,2.25) 5(-5.67,1.75) 6(-5.67,1.25) 7(-5.67,0.75) 8(-5.67,0.25) 9(-5.67,-0.25) 10(-5.67,-0.75) 11(-5.67,-1.25) 12(-5.67,-1.75) 13(-5.67,-2.25) 14(-5.67,-2.75) 15(-5.67,-3.25) 16(-5.67,-3.75) 33(5.67,-3.75) 34(5.67,-3.25) 35(5.67,-2.75) 36(5.67,-2.25) 37(5.67,-1.75) 38(5.67,-1.25) 39(5.67,-0.75) 40(5.67,-0.25) 41(5.67,0.25) 42(5.67,0.75) 43(5.67,1.25) 44(5.67,1.75) 45(5.67,2.25) 46(5.67,2.75) 47(5.67,3.25) 48(5.67,3.75)
  rect 0.28x1.47 smd: 17(-3.75,-5.67) 18(-3.25,-5.67) 19(-2.75,-5.67) 20(-2.25,-5.67) 21(-1.75,-5.67) 22(-1.25,-5.67) 23(-0.75,-5.67) 24(-0.25,-5.67) 25(0.25,-5.67) 26(0.75,-5.67) 27(1.25,-5.67) 28(1.75,-5.67) 29(2.25,-5.67) 30(2.75,-5.67) 31(3.25,-5.67) 32(3.75,-5.67) 49(3.75,5.67) 50(3.25,5.67) 51(2.75,5.67) 52(2.25,5.67) 53(1.75,5.67) 54(1.25,5.67) 55(0.75,5.67) 56(0.25,5.67) 57(-0.25,5.67) 58(-0.75,5.67) 59(-1.25,5.67) 60(-1.75,5.67) 61(-2.25,5.67) 62(-2.75,5.67) 63(-3.25,5.67) 64(-3.75,5.67)
  silkscreen extent -6.68,-5 5,5, body extent -5.99,-5.99 5.99,5.99, height 1.2
"100-VQFN (12x12)" [mil]
  rect 40x8 smd mask+2.17: 1(-228,188.98) 2(-228,173.23) 3(-228,157.48) 4(-228,141.73) 5(-228,125.98) 6(-228,110.24) 7(-228,94.49) 8(-228,78.74) 9(-228,62.99) 10(-228,47.24) 11(-228,31.5) 12(-228,15.75) 13(-228,0) 14(-228,-15.75) 15(-228,-31.5) 16(-228,-47.24) 17(-228,-62.99) 18(-228,-78.74) 19(-228,-94.49) 20(-228,-110.24) 21(-228,-125.98) 22(-228,-141.73) 23(-228,-157.48) 24(-228,-173.23) 25(-228,-188.98) 51(228,-188.98) 52(228,-173.23) 53(228,-157.48) 54(228,-141.73) 55(228,-125.98) 56(228,-110.24) 57(228,-94.49) 58(228,-78.74) 59(228,-62.99) 60(228,-47.24) 61(228,-31.5) 62(228,-15.75) 63(228,0) 64(228,15.75) 65(228,31.5) 66(228,47.24) 67(228,62.99) 68(228,78.74) 69(228,94.49) 70(228,110.24) 71(228,125.98) 72(228,141.73) 73(228,157.48) 74(228,173.23) 75(228,188.98)
  rect 8x40 smd mask+2.17: 26(-188.98,-228) 27(-173.23,-228) 28(-157.48,-228) 29(-141.73,-228) 30(-125.99,-228) 31(-110.24,-228) 32(-94.49,-228) 33(-78.74,-228) 34(-62.99,-228) 35(-47.24,-228) 36(-31.5,-228) 37(-15.75,-228) 38(0,-228) 39(15.75,-228) 40(31.5,-228) 41(47.24,-228) 42(62.99,-228) 43(78.74,-228) 44(94.49,-228) 45(110.24,-228) 46(125.98,-228) 47(141.73,-228) 48(157.48,-228) 49(173.23,-228) 50(188.98,-228) 76(188.98,228) 77(173.23,228) 78(157.48,228) 79(141.73,228) 80(125.98,228) 81(110.24,228) 82(94.49,228) 83(78.74,228) 84(62.99,228) 85(47.24,228) 86(31.5,228) 87(15.75,228) 88(0,228) 89(-15.75,228) 90(-31.5,228) 91(-47.24,228) 92(-62.99,228) 93(-78.74,228) 94(-94.49,228) 95(-110.24,228) 96(-125.99,228) 97(-141.73,228) 98(-157.48,228) 99(-173.23,228) 100(-188.98,228)
  rect 319x319 smd mask+2.17: 101(0,0)
  silkscreen extent -260,-239 239,239, body extent -236,-236 236,236, height 35
1053131303 [mm]
  rect 1.8x1.8 hole 1.2 paste-0.85 mask+0.076: 1(2.5,3.59)
  round 1.8 hole 1.2 paste-0.85 mask+0.076: 2(0,3.59) 3(-2.5,3.59)
  round 0 hole 1.6 slot 1.75 at 0 deg unplated paste-0.8 mask+0.076: 7(2.5,-3.59)
  round 0 hole 1.62 unplated paste-0.8 mask+0.076: 8(-2.5,-3.59)
  silkscreen extent -4.22,-5.82 4.22,4.39, body extent -4.17,-8.28 4.27,3.88, height 6.64
1053131304 [mm]
  rect 1.8x1.8 hole 1.2 paste-0.85 mask+0.076: 1(3.75,3.59)
  round 1.8 hole 1.2 paste-0.85 mask+0.076: 2(1.25,3.59) 3(-1.25,3.59) 4(-3.75,3.59)
  round 0 hole 1.6 slot 1.75 at 0 deg unplated paste-0.8 mask+0.076: 7(3.75,-3.59)
  round 0 hole 1.62 unplated paste-0.8 mask+0.076: 8(-3.75,-3.59)
  silkscreen extent -5.47,-5.78 5.47,4.39, body extent -5.47,-8.27 5.47,3.89, height 6.64
1053131306 [mm]
  rect 1.8x1.8 hole 1.2 paste-0.85 mask+0.076: 1(6.25,3.59)
  round 1.8 hole 1.2 paste-0.85 mask+0.076: 2(3.75,3.59) 3(1.25,3.59) 4(-1.25,3.59) 5(-3.75,3.59) 6(-6.25,3.59)
  round 0 hole 1.6 slot 1.75 at 0 deg unplated paste-0.8 mask+0.076: 7(6.25,-3.59)
  round 0 hole 1.62 unplated paste-0.8 mask+0.076: 8(-6.25,-3.59)
  silkscreen extent -7.97,-5.86 7.97,4.39, body extent -7.97,-8.27 7.97,3.89, height 6.6
1053141310 [mm]
  rect 1.8x1.8 hole 1.2 paste-0.85 mask+0.076: 1(5,4.84)
  round 1.8 hole 1.2 paste-0.85 mask+0.076: 2(2.5,4.84) 3(0,4.84) 4(-2.5,4.84) 5(-5,4.84) 6(5,2.34) 7(2.5,2.34) 8(0,2.34) 9(-2.5,2.34) 10(-5,2.34)
  round 0 hole 1.6 slot 1.75 at 0 deg unplated paste-0.8 mask+0.076: 11(5,-4.84)
  round 0 hole 1.62 unplated paste-0.8 mask+0.076: 12(-5,-4.84)
  silkscreen extent -6.72,-8.04 6.72,5.65, body extent -6.72,-9.53 6.72,5.13, height 9.35
1054301305 [mm]
  rect 1.24x2.5 smd mask+0.076: 1(5.3,2.465) 2(2.8,2.465) 3(0.3,2.465) 4(-2.2,2.465) 5(-4.7,2.465)
  rect 1.1x8.2 smd mask+0.076: S1(-7.27,-2.465) S2(7.27,-2.465)
  silkscreen extent -8.12,-6.56 8.12,2.96, body extent -8.12,-8.15 8.12,3.28, height 6.99
1718561004 [mm]
  rect 2.2x2.2 hole 1.15: 1(-3.81,0)
  round 2.2 hole 1.15: 2(-1.27,0) 3(1.27,0) 4(3.81,0)
  silkscreen extent -5.05,-3.23 5.05,3.23, body extent -5,-3.18 5,3.18, height 10.73
Cap-0402 [mil]
  rect 18x25 smd mask+2.36: 1(-18.5,0) 2(18.5,0)
  silkscreen extent -31,-16 31,16, body extent -20,-10 20,10, height 19
Cap-0603 [mil]
  rect 30x35 smd mask+2.36: 1(-30,0) 2(30,0)
  silkscreen extent -49,-21 49,21, body extent -32,-16 31,16, height 34
Cap-0805 [mil] "SMD 0805"
  rect 40x60 smd mask+2.76: 1(-40,0) 2(40,0)
  silkscreen extent -64,-34 64,34, body extent -39,-25 39,25, height 30
"Diode 0402" [mm]
  rect 0.58x0.6 smd: 1(-0.485,0) 2(0.485,0)
  silkscreen extent -0.89,-0.41 0.89,0.41, body extent -0.5,-0.25 0.5,0.25, height 0.5
"HDR 1x3 Straight (1.27mm)" [mm]
  round 1.05 hole 0.72: 1(-1.27,0) 1(-1.27,0) 2(0,0) 3(1.27,0)
  silkscreen extent -2.29,-1.19 2.29,1.2
"HDR 2x6 Straight (2.54mm)" [mm]
  rect 2x2 hole 1.2 paste+0 mask+0.051: 1(-6.35,-1.27)
  round 2 hole 1.2 paste+0 mask+0.051: 2(-6.35,1.27) 3(-3.81,-1.27) 4(-3.81,1.27) 5(-1.27,-1.27) 6(-1.27,1.27) 7(1.27,-1.27) 8(1.27,1.27) 9(3.81,-1.27) 10(3.81,1.27) 11(6.35,-1.27) 12(6.35,1.27)
  silkscreen extent -7.62,-2.5 7.62,2.5, body extent -7.64,-2.51 7.61,2.47, height 9.2
"IND-0603 (1608 Metric)" [mm] "0.063\" L x 0.032\" W (1.60mm x 0.80mm)"
  rect 0.6x0.8 smd: 1(-0.7,0) 2(0.7,0)
  silkscreen extent -0.2,-0.46 0.23,0.46, body extent -0.8,-0.4 0.8,0.4, height 0.78
LED-0603 [mm]
  rect 0.5x1 smd: 1(-0.75,0) 2(0.75,0)
  silkscreen extent -1.12,-0.66 1.75,0.66, body extent -0.82,-0.37 0.82,0.36, height 0.68
"M4 Mounting Hole"#1 [mm]
  round 8 hole 4.5: MH(-114.696,1.219)
"M4 Mounting Hole"#2 [mm]
  round 8 hole 4.5: MH(0,0)
"M4 Mounting Hole"#3 [mm]
  round 8 hole 4.5: MH(-58.638,76.225)
"M4 Mounting Hole"#4 [mm]
  round 8 hole 4.5: MH(-143.119,76.225)
MMBT2222ATT3G [mm]
  rect 0.99x0.3 smd: 1(0,1) 2(0,0) 3(1.44,0.5)
  silkscreen extent 0.81,-0.3 1.12,1.3, body extent -0.08,-0.3 1.52,1.3, height 0.9
N3314-5202RB [mil]
  rect 55x55 hole 35: 1(0,0)
  round 55 hole 35: 2(0,100) 3(100,0) 4(100,100) 5(200,0) 6(200,100) 7(300,0) 8(300,100) 9(400,0) 10(400,100) 11(500,0) 12(500,100) 13(600,0) 14(600,100)
  round 156 hole 116: 15(-232,71) 16(832,71)
  silkscreen extent -432,-51 1032,489
NEO-M8Q-01A [mm]
  rect 1.8x0.8 smd paste-2: 1(-6,7) 2(-6,5.9) 3(-6,4.8) 4(-6,3.7) 5(-6,2.6) 6(-6,1.5) 7(-6,0.4) 8(-6,-2.6) 9(-6,-3.7) 10(-6,-4.8) 11(-6,-5.9) 12(-6,-7) 13(6,-7) 14(6,-5.9) 15(6,-4.8) 16(6,-3.7) 17(6,-2.6) 18(6,0.4) 19(6,1.5) 20(6,2.6) 21(6,3.7) 22(6,4.8) 23(6,5.9) 24(6,7)
  silkscreen extent -7.32,-8 6.1,8, body extent -6.1,-8 6.1,8, height 2.6
NR3012T2R2M [mm]
  rect 0.8x2.7 smd: 1(-1.1,0) 2(1.1,0)
  silkscreen extent -1.55,-1.6 1.55,1.6, body extent -1.55,-1.55 1.55,1.55, height 1.19
Res-0402 [mil]
  rect 18x25 smd mask+2.17: 1(-18.5,0) 2(18.5,0)
  silkscreen extent -32,-17 32,16, body extent -23,-11 23,11, height 16
Res-0805 [mil] "SMD 0805"
  rect 40x50 smd: 1(-40,0) 2(40,0)
  silkscreen extent -64,-29 64,29, body extent -39,-25 39,24, height 24
SMA-J-P-H-ST-TH1 [mm]
  round 2.4 hole 1.6: 1(0,0) 2(2.54,-2.54) 3(2.54,2.54) 4(-2.54,2.54) 5(-2.54,-2.54)
  silkscreen extent -3.5,-3.5 3.5,3.5, body extent -3.5,-3.5 3.5,3.5, height 9.55
SMD2520-4P [mm]
  rect 1x0.9 smd: 1(-0.925,-0.775) 2(0.925,-0.775) 3(0.925,0.775) 4(-0.925,0.775)
  silkscreen extent -1.73,-1.09 1.35,1.09, body extent -1.3,-1.05 1.3,1.05, height 0.55
SOIC-8 [mm]
  rect 1.55x0.6 smd: 1(-2.7,1.905) 2(-2.7,0.635) 3(-2.7,-0.635) 4(-2.7,-1.905) 5(2.7,-1.905) 6(2.7,-0.635) 7(2.7,0.635) 8(2.7,1.905)
  silkscreen extent -3.76,-2.49 1.99,2.49, body extent -3,-2.45 3,2.45, height 1.7
"SOIC-8(0.154\", 3.90mm Width)" [mm]
  rect 1.55x0.6 smd: 1(-2.7,1.905) 2(-2.7,0.635) 3(-2.7,-0.635) 4(-2.7,-1.905) 5(2.7,-1.905) 6(2.7,-0.635) 7(2.7,0.635) 8(2.7,1.905)
  silkscreen extent -3.79,-2.51 1.8,2.51, body extent -3.01,-2.45 3.01,2.45, height 1.63
SOIC-14 [mm]
  rect 1.62x0.67 smd: 1(-2.7,3.81) 2(-2.7,2.54) 3(-2.7,1.27) 4(-2.7,0) 5(-2.7,-1.27) 6(-2.7,-2.54) 7(-2.7,-3.81) 8(2.7,-3.81) 9(2.7,-2.54) 10(2.7,-1.27) 11(2.7,0) 12(2.7,1.27) 13(2.7,2.54) 14(2.7,3.81)
  silkscreen extent -3.84,-4.37 1.88,4.37, body extent -3.01,-4.33 3.01,4.33, height 1.75
SOT-23 [mm] "TRANS NPN 40V 0.6A SOT23"
  rect 0.82x0.92 smd: 1(-0.95,-1) 2(0.95,-1) 3(0,1)
  silkscreen extent -1.68,-1.3 1.55,0.81, body extent -1.5,-1.25 1.5,1.25, height 1.05
SOT-23-5 [mm]
  rect 1.1x0.6 smd: 1(-1.3,0.95) 2(-1.3,0) 3(-1.3,-0.95) 4(1.3,-0.95) 5(1.3,0.95)
  silkscreen extent -2.13,-1.5 0.88,1.5, body extent -1.4,-1.45 1.4,1.45, height 1.45
SOT-23-6 [mm]
  rect 1.22x0.62 smd: 1(-1.31,0.95) 2(-1.31,0) 3(-1.31,-0.95) 4(1.31,-0.95) 5(1.31,0) 6(1.31,0.95)
  silkscreen extent -2.18,-1.52 0.86,1.52, body extent -1.5,-1.5 1.5,1.5, height 1.47
"Test Point -TH 1.8mm Hole size 0.92mm"#1 [mm]
  oct 1.8x1.8 hole 0.92: 1(0,0)
  silkscreen extent -1.04,-1.04 1.04,1.07
"Test Point -TH 1.8mm Hole size 0.92mm"#2 [mm]
  round 1.016 hole 0.508: 1(5.918,-4.42)
"Test Point -TH 1.8mm Hole size 0.92mm"#3 [mm]
  round 1.016 hole 0.508: 1(-0.203,0.762)
"Test Point -TH 1.8mm Hole size 0.92mm"#4 [mm]
  round 1.016 hole 0.508: 1(-3.353,-3.073)
"Test Point -TH 1.8mm Hole size 0.92mm"#5 [mm]
  round 1.016 hole 0.508: 1(0,0)
"Test Point -TH 1.8mm Hole size 0.92mm"#6 [mm]
  round 1.016 hole 0.508: 1(2.972,-1.143)
"Test Point -TH 1.8mm Hole size 0.92mm"#7 [mm]
  round 1.016 hole 0.508: 1(4.75,-4.953)
"Test Point -TH 1.8mm Hole size 0.92mm"#8 [mm]
  round 1.016 hole 0.508: 1(-0.33,-2.134)
"Test Point -TH 1.8mm Hole size 0.92mm"#9 [mm]
  round 1.016 hole 0.508: 1(-0.406,-0.737)
TSOT-25 [mm]
  rect 1x0.7 smd: 1(-1.1,0.95) 2(-1.1,0) 3(-1.1,-0.95) 4(1.1,-0.95) 5(1.1,0.95)
  silkscreen extent -1.91,-1.55 1.17,1.55, body extent -1.4,-1.5 1.4,1.5, height 1.4

## Part data
C1 C2 C8 C10 C21 C23 C30 C31 C32 C33: library part CC0402KRX5R6BB105, "CAP CER 1UF 10V X5R 0402", Case Code (Imperial)=0402, Case Code (Metric)=1005, Dielectric=X5R, LCSC Part Number=C106254, Manufacturer=Yageo, Max Operating Temperature=85°C, Min Operating Temperature=-55°C, Package Quantity=1, Resistor Type=Ceramic, Supplier Part Number 1=603-CC402KRX5R6BB105, Tolerance=10%, Voltage Rating=10V, Capacitance=1uF, Case/Package=0402, Category="Ceramic Capacitors", ComponentLink1Description=https://datasheet.ciiva.com/176/upy-gphc-x5r-4v-to-50v-12-176704.pdf?src-supplier=Digi-Key, ComponentLink1URL=https://datasheet.ciiva.com/176/upy-gphc-x5r-4v-to-50v-12-176704.pdf?src-supplier=Digi-Key, ComponentLink2Description=https://datasheet.ciiva.com/176/mlccorderingcode-176705.pdf?src-supplier=Digi-Key, ComponentLink2URL=https://datasheet.ciiva.com/176/mlccorderingcode-176705.pdf?src-supplier=Digi-Key, ComponentLink3Description=https://datasheet.ciiva.com/176/mlccorderingcode-176706.pdf?src-supplier=Digi-Key, ComponentLink3URL=https://datasheet.ciiva.com/176/mlccorderingcode-176706.pdf?src-supplier=Digi-Key, Construction=Flat, Depth=0.5mm, Dissipation Factor=15%, Halogen Free="Halogen Free", Height=0.5mm, Item Type=Capacitor, Lead Free="Lead Free", Length=1mm, Manufacturer Part Number=CC0402KRX5R6BB105, Mount="Surface Mount", Number of Pins=2, Packaging="Tape and Reel", Pricing 1="1=0.11000, 10=0.05500, 50=0.05500, 100=0.03300, 500=0.02700, 1000=0.02200, 2500=0.02100, 10000=0.01800 (USD)", Radiation Hardening=No, REACH SVHC="No SVHC", RoHS=Yes, RoHS Compliant=Yes, Series=CC, Stock 1=6711367, Supplier 1=Mouser, Termination=SMD/SMT, Thickness=0.022inch, Voltage Rating (DC)=10V, Width=0.02inch
C3 C9 C11 C12 C13 C14 C15 C17 C18 C19 C20 C22 C24 C27 C29 C35 C37 C39 C41 C43 C45 C47 C49 C51 C54 C56 C58 C60 C62 C64 C66 C68 C69 C72 C74 C76 C78: library part GRM155R71C104KA88D, "CAP CER 0.1UF 16V X7R 0402", Case Code (Imperial)=0402, Case Code (Metric)=1005, Dielectric=X7R, Dielectric Material=Ceramic, Insulation Resistance=10GR, LCSC Part Number=C71629, Manufacturer=Murata, Max Operating Temperature=125°C, Min Operating Temperature=-55°C, Package Quantity=1, Tolerance=10%, Voltage=16V, Case/Package=0402, Category="Ceramic Capacitors", ComponentLink1Description=https://datasheet.ciiva.com/129/grm155r71c104ka88-01-129739.pdf?src-supplier=Digi-Key, ComponentLink1URL=https://datasheet.ciiva.com/129/grm155r71c104ka88-01-129739.pdf?src-supplier=Digi-Key, ComponentLink2Description=https://datasheet.ciiva.com/129/grm155r71c104ka88-01-129740.pdf?src-supplier=Digi-Key, ComponentLink2URL=https://datasheet.ciiva.com/129/grm155r71c104ka88-01-129740.pdf?src-supplier=Digi-Key, ComponentLink3Description=https://datasheet.ciiva.com/18102/getdatasheetpartid-85307-18102905.pdf?src-supplier=Verical, ComponentLink3URL=https://datasheet.ciiva.com/18102/getdatasheetpartid-85307-18102905.pdf?src-supplier=Verical, ComponentLink4Description=https://datasheet.ciiva.com/29199/454098-da-01-en-vs-kondensator-0402-29199799.pdf?src-supplier=Conrad, ComponentLink4URL=https://datasheet.ciiva.com/29199/454098-da-01-en-vs-kondensator-0402-29199799.pdf?src-supplier=Conrad, ComponentLink5Description=https://datasheet.ciiva.com/7937/4360-7937615.pdf?src-supplier=Element14, ComponentLink5URL=https://datasheet.ciiva.com/7937/4360-7937615.pdf?src-supplier=Element14, ComponentLink6Description=https://datasheet.ciiva.com/14116/grmseries-highdielectrictype-eng-14116878.pdf?src-supplier=Distrelec, ComponentLink6URL=https://datasheet.ciiva.com/14116/grmseries-highdielectrictype-eng-14116878.pdf?src-supplier=Distrelec, ComponentLink7Description=https://datasheet.ciiva.com/14103/grmseries-highdielectrictype-eng-14103750.pdf?src-supplier=Distrelec, ComponentLink7URL=https://datasheet.ciiva.com/14103/grmseries-highdielectrictype-eng-14103750.pdf?src-supplier=Distrelec, ComponentLink8Description=https://datasheet.ciiva.com/28534/4360-28534127.pdf?src-supplier=Element14, ComponentLink8URL=https://datasheet.ciiva.com/28534/4360-28534127.pdf?src-supplier=Element14, ComponentLink9Description=https://datasheet.ciiva.com/28534/4360-28534133.pdf?src-supplier=Element14, ComponentLink9URL=https://datasheet.ciiva.com/28534/4360-28534133.pdf?src-supplier=Element14, ComponentLink10Description=https://datasheet.ciiva.com/16199/product-16199000.pdf?src-supplier=Future+Electronics, ComponentLink10URL=https://datasheet.ciiva.com/16199/product-16199000.pdf?src-supplier=Future+Electronics, Depth=0.5mm, Height=0.5mm, Item Type=Capacitor, Lead Free="Lead Free", Length=1mm, Manufacturer Part Number=GRM155R71C104KA88D, Material=Ceramic, Mounting Technology="Surface Mount", Packaging="Tape and Reel", Pins=2, Pricing 1="10000=0.00480, 30000=0.00470, 100000=0.00350, 250000=0.00330 (USD)", Radiation Hardening=No, RoHS=Yes, RoHS Compliant=Yes, Series=GRM, Stock 1=1690322, Supplier 1="Arrow Electronics", Supplier Part Number 1=GRM155R71C104KA88D, Termination=SMD/SMT, Thickness=0.022inch, Voltage Rating=16V, Voltage Rating (DC)=16V, Width=0.02inch
C4 C5: library part GRM158R61A226ME15D, "CAP CER 22UF 10V X5R 0402", Case/Package=343Case, Dielectric=1537DielectricType, LCSC Part Number=C3845593, Manufacturer=Murata, Max Operating Temperature=85°C, Min Operating Temperature=-55°C, Supplier Part Number=81-GRM158R61A226ME5D, Tolerance=20%, Voltage Rating=10V, Category="Ceramic Capacitors", Height=800um, Item Type=Capacitor, Length=1mm, Manufacturer Part Number=GRM158R61A226ME15D, Material=4241ConductorMaterial, Pricing="1=0.46, 10=0.225, 50=0.225, 100=0.146, 1000=0.124, 10000=0.106 (USD)", RoHS=Yes, Stock=328944, Supplier=Mouser, Thickness=800um, Voltage Rating (DC)=10V, Width=500um
C6 C26 C52 C73 C80: library part CC0402KRX5R6BB475, "CAP CER 4.7UF 10V X5R 0402", Case Code (Imperial)=0402, Case Code (Metric)=1005, LCSC Part Number=C326586, Manufacturer=Yageo, Max Operating Temperature=85°C, Min Operating Temperature=-55°C, Supplier Part Number 1=3871698, Tolerance=10%, Voltage Rating=10V, Capacitance=4.7uF, Case/Package=0402, Category="Ceramic Capacitors", ComponentLink1Description=http://www.yageo.com/documents/recent/UPY-GPHC_X5R_4V-to-50V_25.pdf?src-supplier=Digi-Key, ComponentLink1URL=http://www.yageo.com/documents/recent/UPY-GPHC_X5R_4V-to-50V_25.pdf?src-supplier=Digi-Key, Manufacturer Part Number=CC0402KRX5R6BB475, Mount="Surface Mount", Packaging="Cut Tape", Pricing 1="10000=0.02310, 50000=0.02100 (GBP)", RoHS=Yes, RoHS Compliant=Yes, Stock 1=20000, Supplier 1=Farnell
C7 C71 C75 C77 C79: library part CC0402MRX5R6BB106, "CAP CER 10UF 10V X5R 0402", Case Code (Imperial)=0402, Case Code (Metric)=1005, LCSC Part Number=C962143, Manufacturer=Yageo, Max Operating Temperature=85°C, Min Operating Temperature=-55°C, Supplier Part Number 1=6097631, Tolerance=20%, Voltage Rating=10V, Capacitance=10uF, Case/Package=0402, Category="Ceramic Capacitors", ComponentLink1Description=http://www.yageo.com/documents/recent/UPY-GPHC_X5R_4V-to-50V_25.pdf?src-supplier=Digi-Key, ComponentLink1URL=http://www.yageo.com/documents/recent/UPY-GPHC_X5R_4V-to-50V_25.pdf?src-supplier=Digi-Key, Item Type=Capacitor, Manufacturer Part Number=CC0402MRX5R6BB106, Mount="Surface Mount", Packaging="Tape and Reel", Pricing 1="10000=0.02650, 20000=0.02590, 30000=0.02550, 40000=0.02530, 50000=0.02450 (USD)", RoHS=Yes, RoHS Compliant=Yes, Stock 1=80000, Supplier 1="Future Electronics"
C16 C25 C28: library part CC0805MKX5R5BB476, "CAP CER 47UF 6.3V X5R 0805", Case Code (Imperial)=0805, Case Code (Metric)=2012, Dielectric=X5R, LCSC Part Number=C109461, Manufacturer=Yageo, Max Operating Temperature=85°C, Min Operating Temperature=-55°C, Resistor Type=Ceramic, Tolerance=20%, Voltage Rating=6.3V, Capacitance=47uF, Case/Package=0805, Category="Ceramic Capacitors", ComponentLink1Description=http://www.mouser.com/ds/2/447/UPY-GPHC_X5R_4V-to-50V_25-1131599.pdf?src-supplier=Mouser, ComponentLink1URL=http://www.mouser.com/ds/2/447/UPY-GPHC_X5R_4V-to-50V_25-1131599.pdf?src-supplier=Mouser, ComponentLink2Description=http://www.yageo.com/documents/recent/UPY-GPHC_X5R_4V-to-50V_25.pdf?src-supplier=Digi-Key, ComponentLink2URL=http://www.yageo.com/documents/recent/UPY-GPHC_X5R_4V-to-50V_25.pdf?src-supplier=Digi-Key, ComponentLink3Description=http://www.yageo.com/documents/recent/UPY-GPHC_X5R_4V-to-50V_19.pdf?src-supplier=Avnet, ComponentLink3URL=http://www.yageo.com/documents/recent/UPY-GPHC_X5R_4V-to-50V_19.pdf?src-supplier=Avnet, Construction=Flat, Depth=1.25mm, Halogen Free="Halogen Free", Item Type=Capacitor, Lead Free="Lead Free", Length=2mm, Manufacturer Part Number=CC0805MKX5R5BB476, Mount="Surface Mount", Packaging="Tape and Reel", Pricing 1="1=0.25650 (USD)", Radiation Hardening=No, RoHS=Yes, RoHS Compliant=Yes, Series=CC, Stock 1=6, Supplier 1="Arrow Electronics", Supplier Part Number 1=CC0805MKX5R5BB476, Termination=SMD/SMT, Thickness=0.057inch, Voltage Rating (DC)=6.3V, Weight=0.000194oz, Width=0.049inch
C34: library part CC0603KRX7R7BB103, "CAP CER 10000PF 16V X7R 0603", Case Code (Imperial)=0603, Case Code (Metric)=1608, Dielectric=X7R, LCSC Part Number=C519406, Manufacturer=Yageo, Max Operating Temperature=125°C, Min Operating Temperature=-55°C, Resistor Type=Ceramic, Tolerance=10%, Voltage Rating=16V, Capacitance=10nF, Case/Package=0603, Category="Ceramic Capacitors", ComponentLink1Description=https://datasheet.ciiva.com/7978/1489800-7978139.pdf?src-supplier=Element14, ComponentLink1URL=https://datasheet.ciiva.com/7978/1489800-7978139.pdf?src-supplier=Element14, Construction=Flat, Depth=0.8mm, Halogen Free="Halogen Free", Height=0.8mm, Item Type=Capacitor, Lead Free="Lead Free", Length=1.6mm, Manufacturer Part Number=CC0603KRX7R7BB103, Mount="Surface Mount", Packaging="Tape and Reel", Pricing 1="1=0.03600 (USD)", Radiation Hardening=No, RoHS=Yes, RoHS Compliant=Yes, Series=CC, Stock 1=3, Supplier 1="Arrow Electronics", Supplier Part Number 1=CC0603KRX7R7BB103, Termination=SMD/SMT, Thickness=0.035inch, Voltage Rating (DC)=16V, Width=0.8mm
C36 C38 C40 C42 C44 C46 C48 C50 C53 C55 C57 C59 C61 C63 C65 C67 C70: library part GRM155R61C102KA01D, "Multilayer Ceramic Capacitor, 1000 pF, 16 V, ± 10%, X5R, 0402 [1005 Metric]", Case Code (Imperial)=0402, Case Code (Metric)=1005, Dielectric=X5R, Manufacturer=Murata, Max Operating Temperature=85°C, Min Operating Temperature=-55°C, Package Quantity=1, Supplier Part Number=490-6308-6-ND, Tolerance=10%, Voltage Rating=16V, Case/Package=0402, Category="Ceramic Capacitors", ComponentLink1Description=https://datasheet.ciiva.com/6263/product-6263633.pdf?src-supplier=Digikey, ComponentLink1URL=https://datasheet.ciiva.com/6263/product-6263633.pdf?src-supplier=Digikey, ComponentLink2Description=https://datasheet.ciiva.com/6263/partnumbering-e-01-6263626.pdf?src-supplier=Digikey, ComponentLink2URL=https://datasheet.ciiva.com/6263/partnumbering-e-01-6263626.pdf?src-supplier=Digikey, ComponentLink3Description=https://datasheet.ciiva.com/6263/partnumbering-e-01-6263629.pdf?src-supplier=Digikey, ComponentLink3URL=https://datasheet.ciiva.com/6263/partnumbering-e-01-6263629.pdf?src-supplier=Digikey, Construction=Flat, Depth=0.5mm, Height=0.5mm, Lead Free="Lead Free", Length=1mm, Manufacturer Part Number=GRM155R61C102KA01D, Mounting Technology="Surface Mount", Packaging="Tape and Reel", Pricing="1=0.1, 10=0.025, 50=0.0142, 100=0.011, 500=0.0083, 1000=0.00651, 2500=0.00592, 5000=0.00545 (USD)", Radiation Hardening=No, RoHS=Yes, RoHS Compliant=Yes, Series=GRM, Stock=36126, Supplier=Digikey, Termination=SMD/SMT, Thickness=0.022inch, Voltage Rating (DC)=16V, Width=0.02inch
D1 D2 D3 D4: "Ultra-Low Capacitance TVS Diode Array, SOT-23-6L, RoHS", Case/Package=SOT-23-6, Clamping Voltage=18V, JLCPCB Part Number=C2649893, Leakage Current=1uA, Manufacturer="Alpha & Omega Semiconductor", Max Operating Temperature=125°C, Min Breakdown Voltage=6.6V, Min Operating Temperature=-40°C, Package Quantity=6000, Peak Pulse Current=4A, Peak Pulse Power=50W, Power Line Protection=Yes, Reverse Standoff Voltage=5.5V, Supplier Part Number=785-1755-1-ND, Category="TVS Diodes", ComponentLink1Description=https://datasheet.ciiva.com/6575/aoz8904cil-6575149.pdf?src-supplier=Digikey, ComponentLink1URL=https://datasheet.ciiva.com/6575/aoz8904cil-6575149.pdf?src-supplier=Digikey, ComponentLink2Description=JLCPCB, ComponentLink2URL=https://jlcpcb.com/partdetail/Alpha_OmegaSemicon-AOZ8904CIL/C2649893, Depth=1.6mm, Direction=Unidirectional, Item Type=IC, Length=2.9mm, Manufacturer Part Number=AOZ8904CIL, Mounting Technology="Surface Mount", Number of Bidirectional Channels=4, Number of Unidirectional Channels=4, Package=SOT-23-6, Packaging="Tape and Reel", Pins=6, Pricing="1=0.34, 10=0.235, 100=0.1187, 500=0.09684, 1000=0.07185 (USD)", Radiation Hardening=No, RoHS=Yes, RoHS Compliant=Yes, Series=-, Stock=1165949, Supplier=Digikey, Working Voltage=5.5V
D5: "AUTOMOTIVE DIODE ESD 3.3VWM 5.5V", Manufacturer=Comchip, Supplier Part Number=641-ACPDQC3V3HT-HFCT-ND, Item Type=Diode, Manufacturer Part Number=ACPDQC3V3HT-HF, Pricing="1=0.37, 10=0.255, 100=0.1244, 500=0.10378, 1000=0.07211, 2000=0.0625 (USD)", RoHS=No, Stock=4462, Supplier=Digikey
J4: "CONN HEADER R/A 6POS 2.5MM", Manufacturer=Molex, Supplier Part Number=538-105313-1306, ComponentLink1Description=https://www.molex.com/pdm_docs/sd/1053131102_sd.pdf?src-supplier=Digikey, ComponentLink1URL=https://www.molex.com/pdm_docs/sd/1053131102_sd.pdf?src-supplier=Digikey, Item Type=Header, Manufacturer Part Number=105313-1306, Pricing="1=2.09, 10=1.9, 50=1.9, 100=1.65, 1000=1.48, 10000=1.39 (USD)", RoHS=Yes, Stock=1427, Supplier=Mouser
J6: "3000 Series; 2.54mm Pitch 14 Way 2 Row Right Angle PCB Header; Solder Term; 2A", Color=Black, Current Rating=1A, Flammability Rating="UL94 V-0", Manufacturer=3M, Max Current Rating=2A, Max Operating Temperature=105°C, Min Operating Temperature=-55°C, Package Quantity=100, Supplier Part Number=MHR14S-ND, Voltage Rating=1kV, Voltage Rating (AC)=350V, Category="Headers and Wire Housings", ComponentLink1Description=https://datasheet.ciiva.com/15188/getdatasheetpartid-335427-15188603.pdf?src-supplier=Verical, ComponentLink1URL=https://datasheet.ciiva.com/15188/getdatasheetpartid-335427-15188603.pdf?src-supplier=Verical, ComponentLink2Description=https://datasheet.ciiva.com/11754/0900766b8077b7df-11754186.pdf?src-supplier=Rs, ComponentLink2URL=https://datasheet.ciiva.com/11754/0900766b8077b7df-11754186.pdf?src-supplier=Rs, ComponentLink3Description=https://datasheet.ciiva.com/719/ts0772-719288.pdf?src-supplier=Digikey, ComponentLink3URL=https://datasheet.ciiva.com/719/ts0772-719288.pdf?src-supplier=Digikey, ComponentLink4Description=https://datasheet.ciiva.com/8051/94653-8051014.pdf?src-supplier=Element14, ComponentLink4URL=https://datasheet.ciiva.com/8051/94653-8051014.pdf?src-supplier=Element14, Connector Type=Header, Contact Finish - Mating=GOLD, Contact Material="Copper Alloy,Copper", Contact Plating=Gold, Contact Shape=Square, Contact Type="Male Pin", Depth=24.6mm, Fastening Type=Latch, Gender=Male, Housing Color=Black, Housing Material=Polyester, Insulation Color=Black, Insulation Material=Glass, Item Type=Header, Lead Free="Lead Free", Lead Pitch=2.54mm, Length=37.21mm, Manufacturer Part Number=N3314-5202RB, Mounting Technology="Through Hole", Number of Contacts=14, Number of Poles=14, Number of Positions=14, Number of Rows=2, Orientation="Right Angle", Packaging=Bulk, Pitch=2.54mm, Pricing="1=2.23, 10=2.026, 350=1.57111 (USD)", Reach SVHC Compliant=No, RoHS=Yes, RoHS Compliant=Yes, Series=3000, Stock=7247, Supplier=Digikey, Termination=Solder, Working Voltage=350V
J10: "CONN HEADER R/A 10POS 2.5MM", Insulation Color=Black, Manufacturer=Molex, Max Operating Temperature=105°C, Min Operating Temperature=-40°C, Supplier Part Number=538-105314-1310, ComponentLink1Description=https://www.molex.com/pdm_docs/sd/1053141104_sd.pdf?src-supplier=Digikey, ComponentLink1URL=https://www.molex.com/pdm_docs/sd/1053141104_sd.pdf?src-supplier=Digikey, ComponentLink2Description=http://www.farnell.com/datasheets/2788570.pdf?src-supplier=Newark, ComponentLink2URL=http://www.farnell.com/datasheets/2788570.pdf?src-supplier=Newark, Connector Type=Header, Contact Finish - Mating=GOLD, Contact Material=Brass, Contact Shape=Square, Contact Type="Male Pin", Fastening Type=Latch, Insulation Material=Polymer, Item Type=Headers, Manufacturer Part Number=105314-1310, Mounting Technology="Through Hole", Number of Positions=10, Number of Rows=2, Packaging=Tray, Pricing="1=2.66, 10=2.31, 50=2.31, 100=2.15, 1000=2.15, 10000=1.95 (USD)", RoHS=Yes, RoHS Compliant=Yes, Series="Nano-Fit 105314", Stock=1648, Supplier=Mouser, Termination=Solder
J11 J19 J22: "NANO-FIT HDR SMT RA SGL 5CKT 30A", Manufacturer=Molex, Supplier Part Number=538-105430-1305, Item Type=Header, Manufacturer Part Number=105430-1305, Pricing="1=3.62, 10=3.19, 50=3.19, 100=2.54, 1000=2.19, 10000=2.15 (USD)", RoHS=No, Stock=818, Supplier=Mouser
J16: "CONN HEADER R/A 3POS 2.5MM", Insulation Color=Black, Manufacturer=Molex, Max Operating Temperature=105°C, Min Operating Temperature=-40°C, Supplier Part Number=538-105313-1303, Voltage Rating=250V, ComponentLink1Description=https://www.molex.com/pdm_docs/sd/1053131102_sd.pdf?src-supplier=Digikey, ComponentLink1URL=https://www.molex.com/pdm_docs/sd/1053131102_sd.pdf?src-supplier=Digikey, Connector Type=Header, Contact Finish - Mating=GOLD, Contact Material=Brass, Contact Shape=Square, Contact Type="Male Pin", Fastening Type=Latch, Insulation Material=Polymer, Item Type=Header, Manufacturer Part Number=105313-1303, Mounting Technology="Through Hole", Number of Positions=3, Number of Rows=1, Packaging=Tray, Pricing="1=1.27, 10=1.08, 50=1.08, 100=0.945, 1000=0.945, 10000=0.945 (USD)", RoHS=Yes, RoHS Compliant=Yes, Series="Nano-Fit 105313", Stock=1725, Supplier=Mouser, Termination=Solder